# Altium PCB Sampler_DIOT.PCBDOC (part 1 of 11)
Units mm, origin at the board's own origin, x right, y up, seen from the top; angles counter-clockwise.
Board outline 222.9 x 100 mm, 4 copper layers (L1, P2, L3, L4), stack 1.6 mm thick; 754 components, 442 nets, 2347 pads, 1230 vias.
Unrouted connection lines stored in the file: 10.
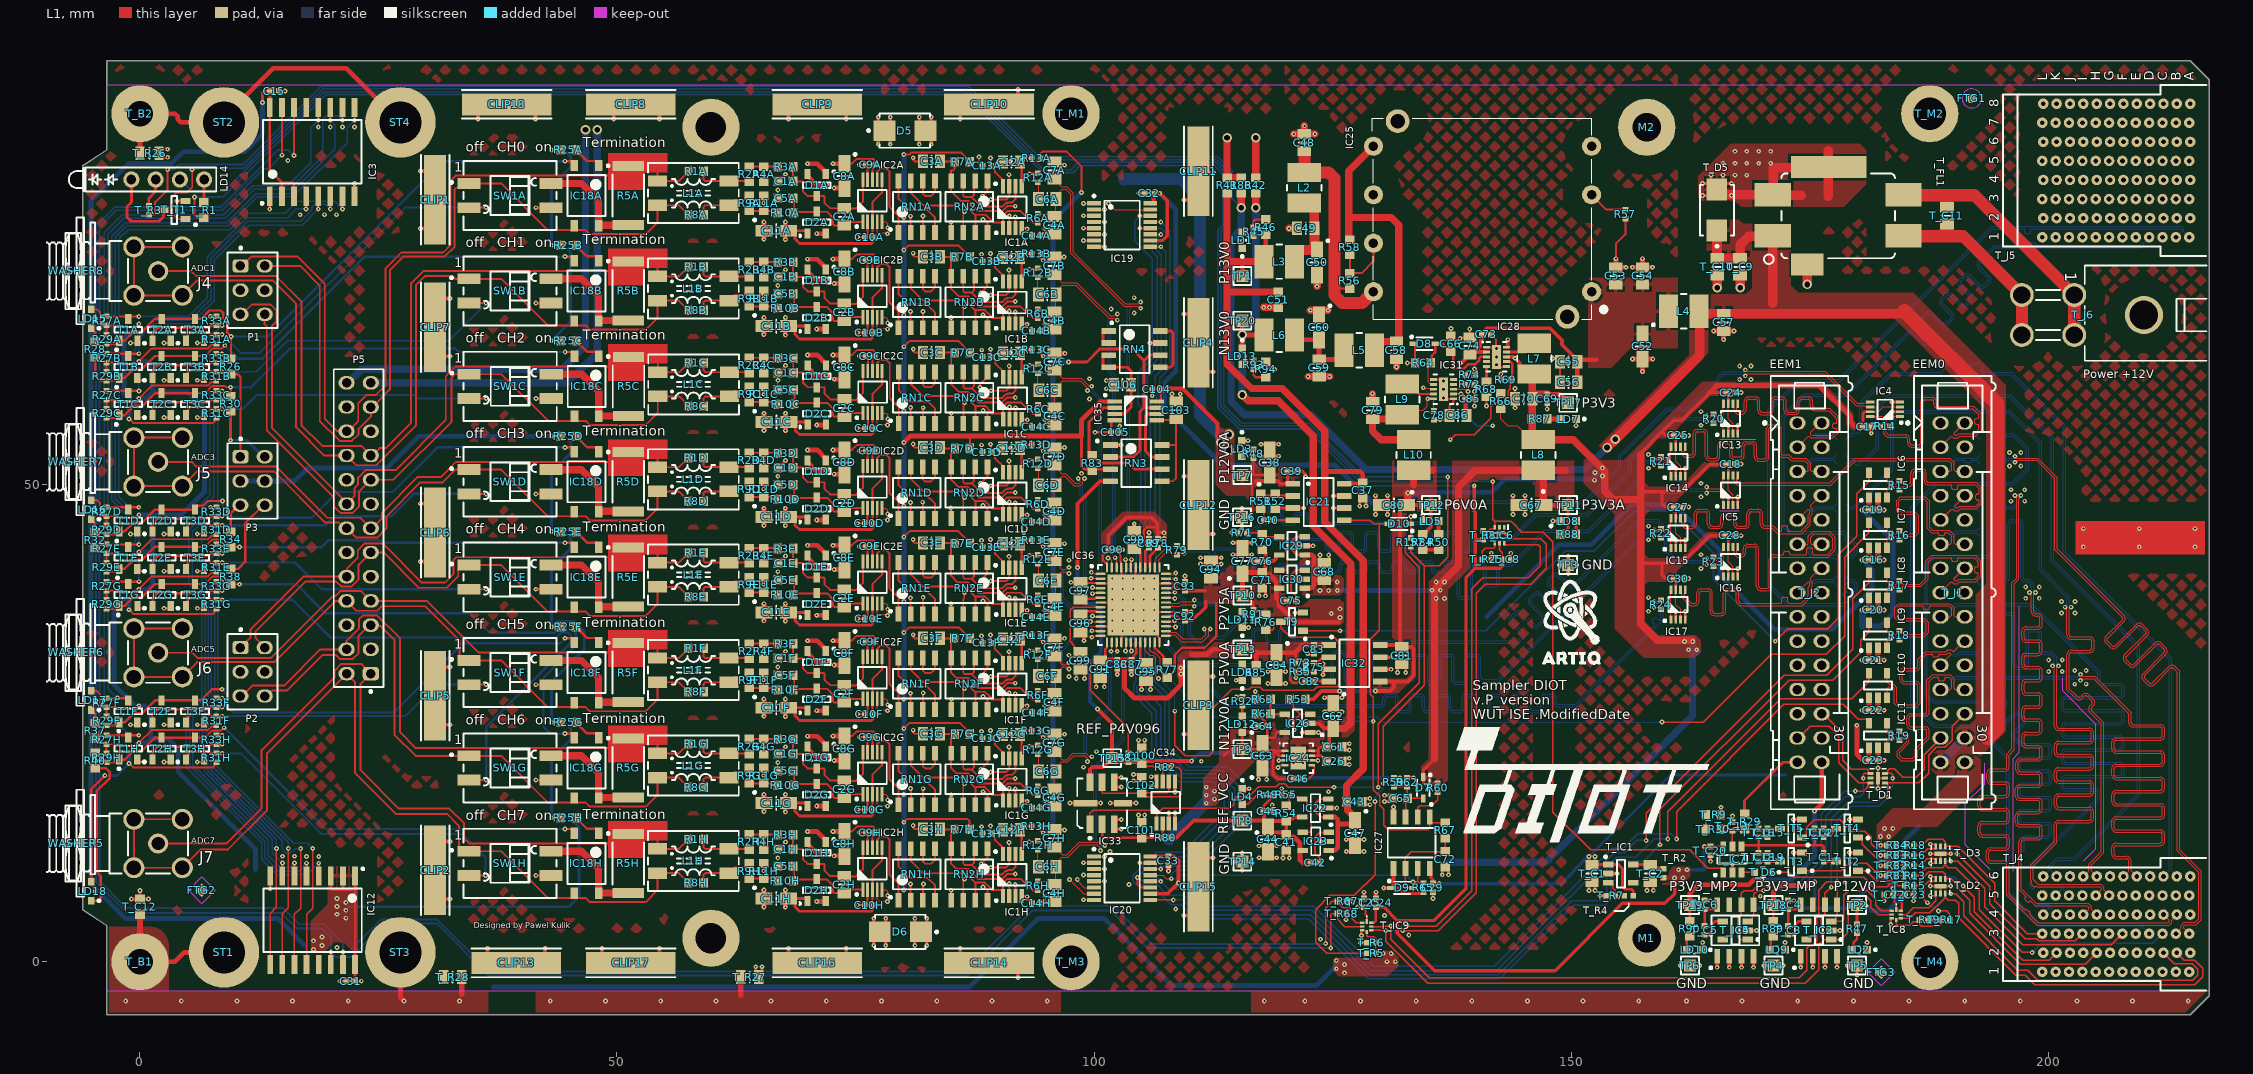
[diagram p0: L1 view]
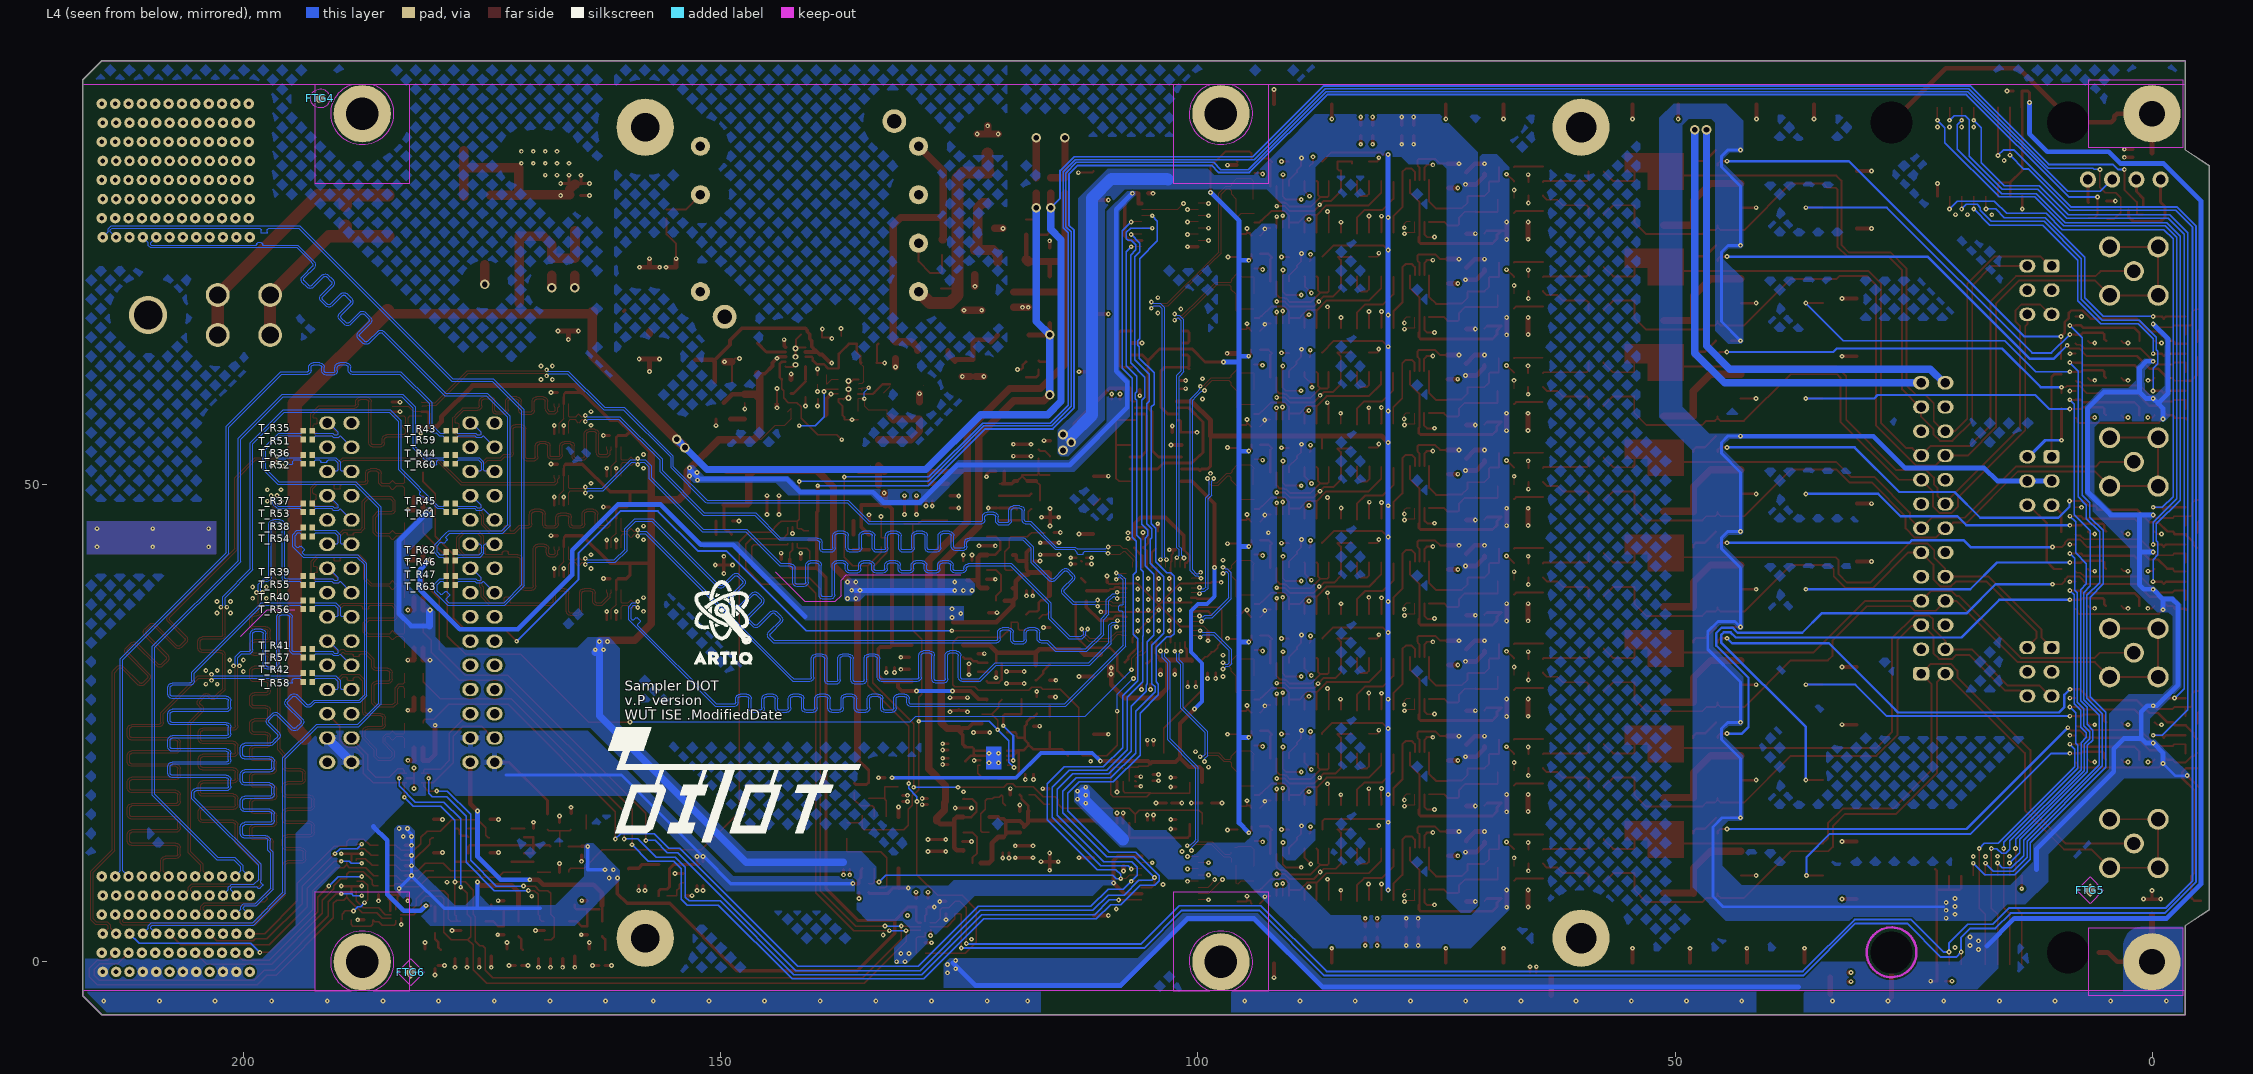
[diagram p1: L4 view, seen from below]
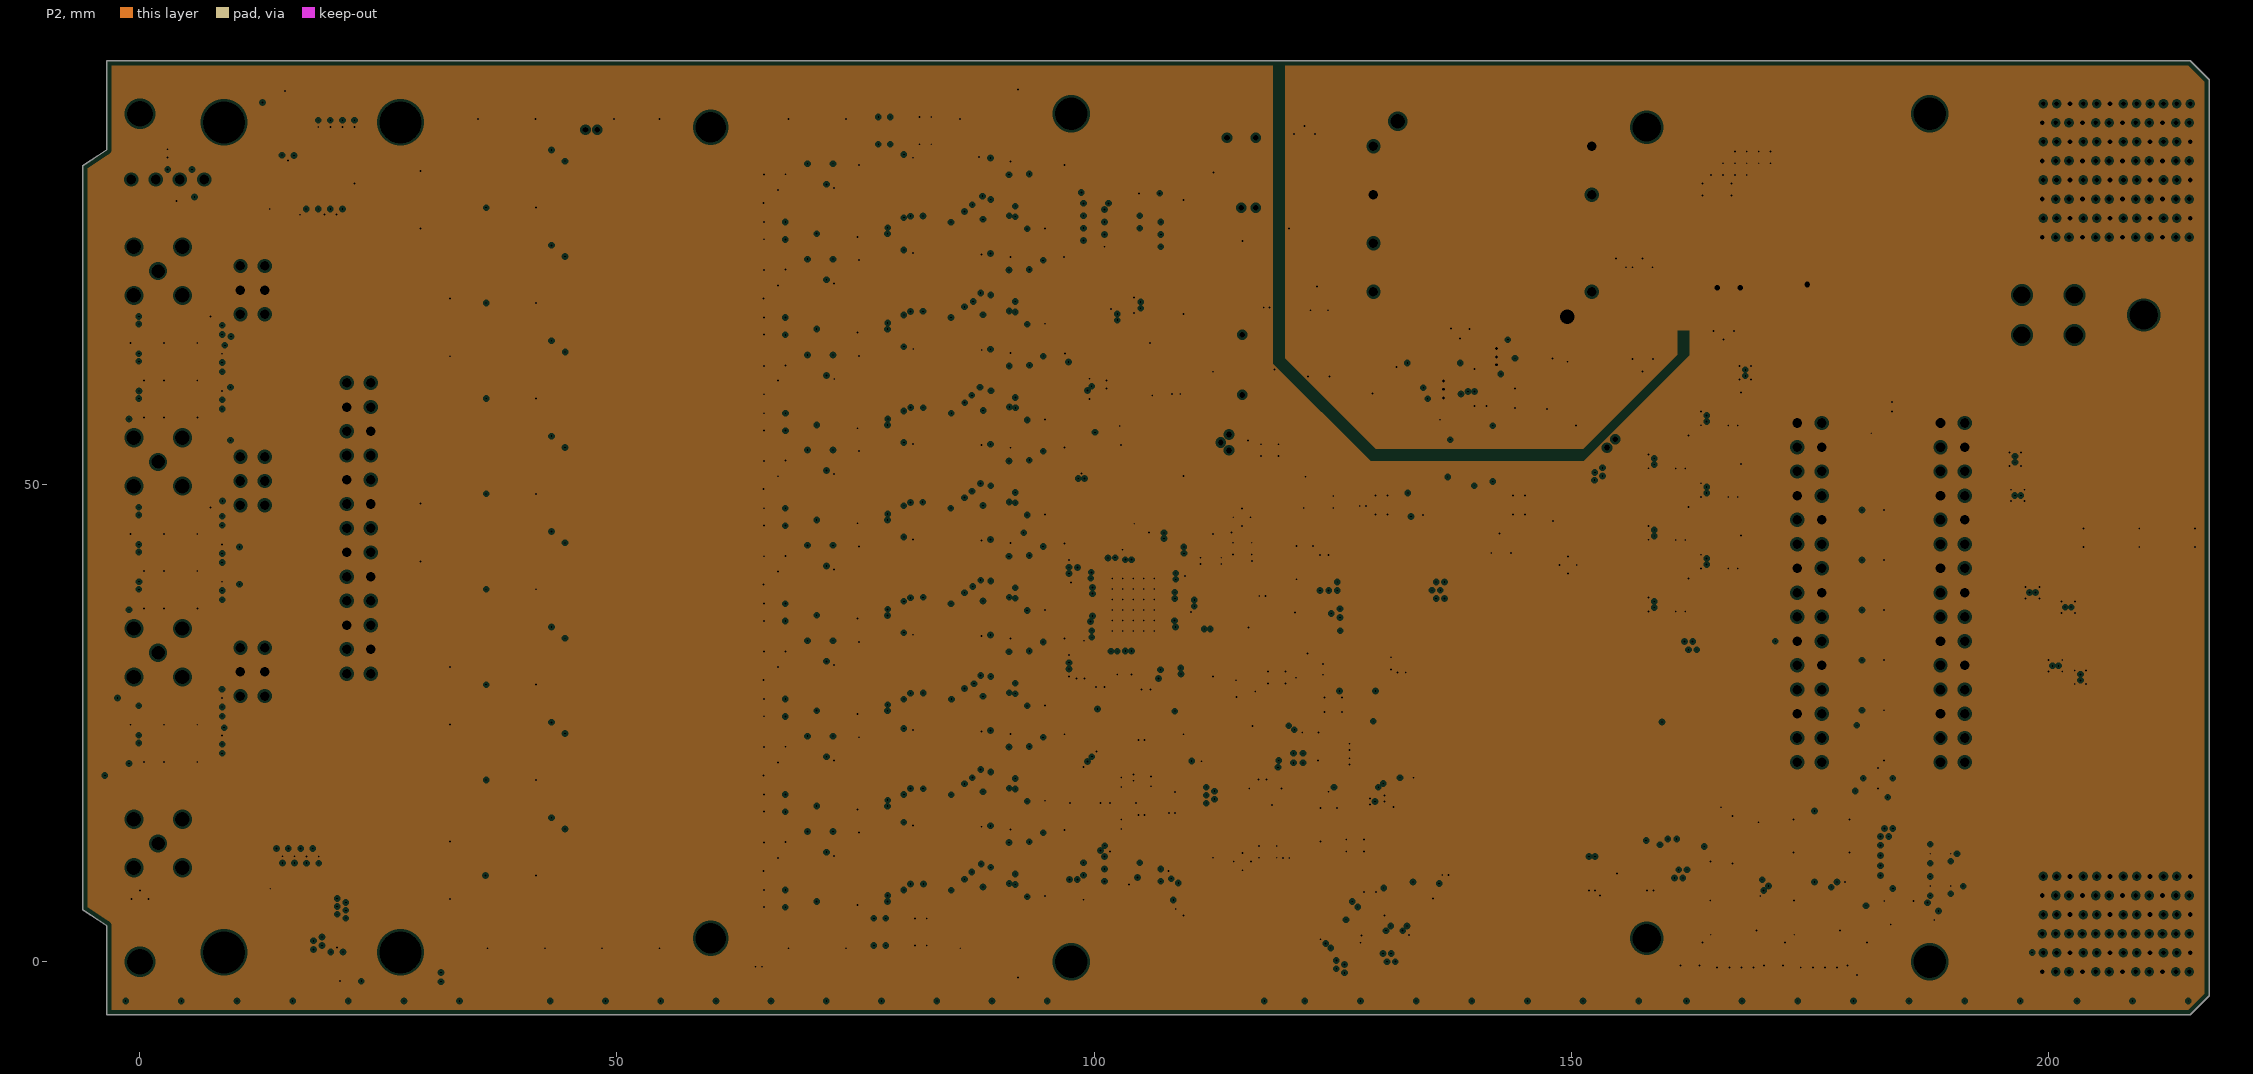
[diagram p2: P2, clearances drawn from the general rule]
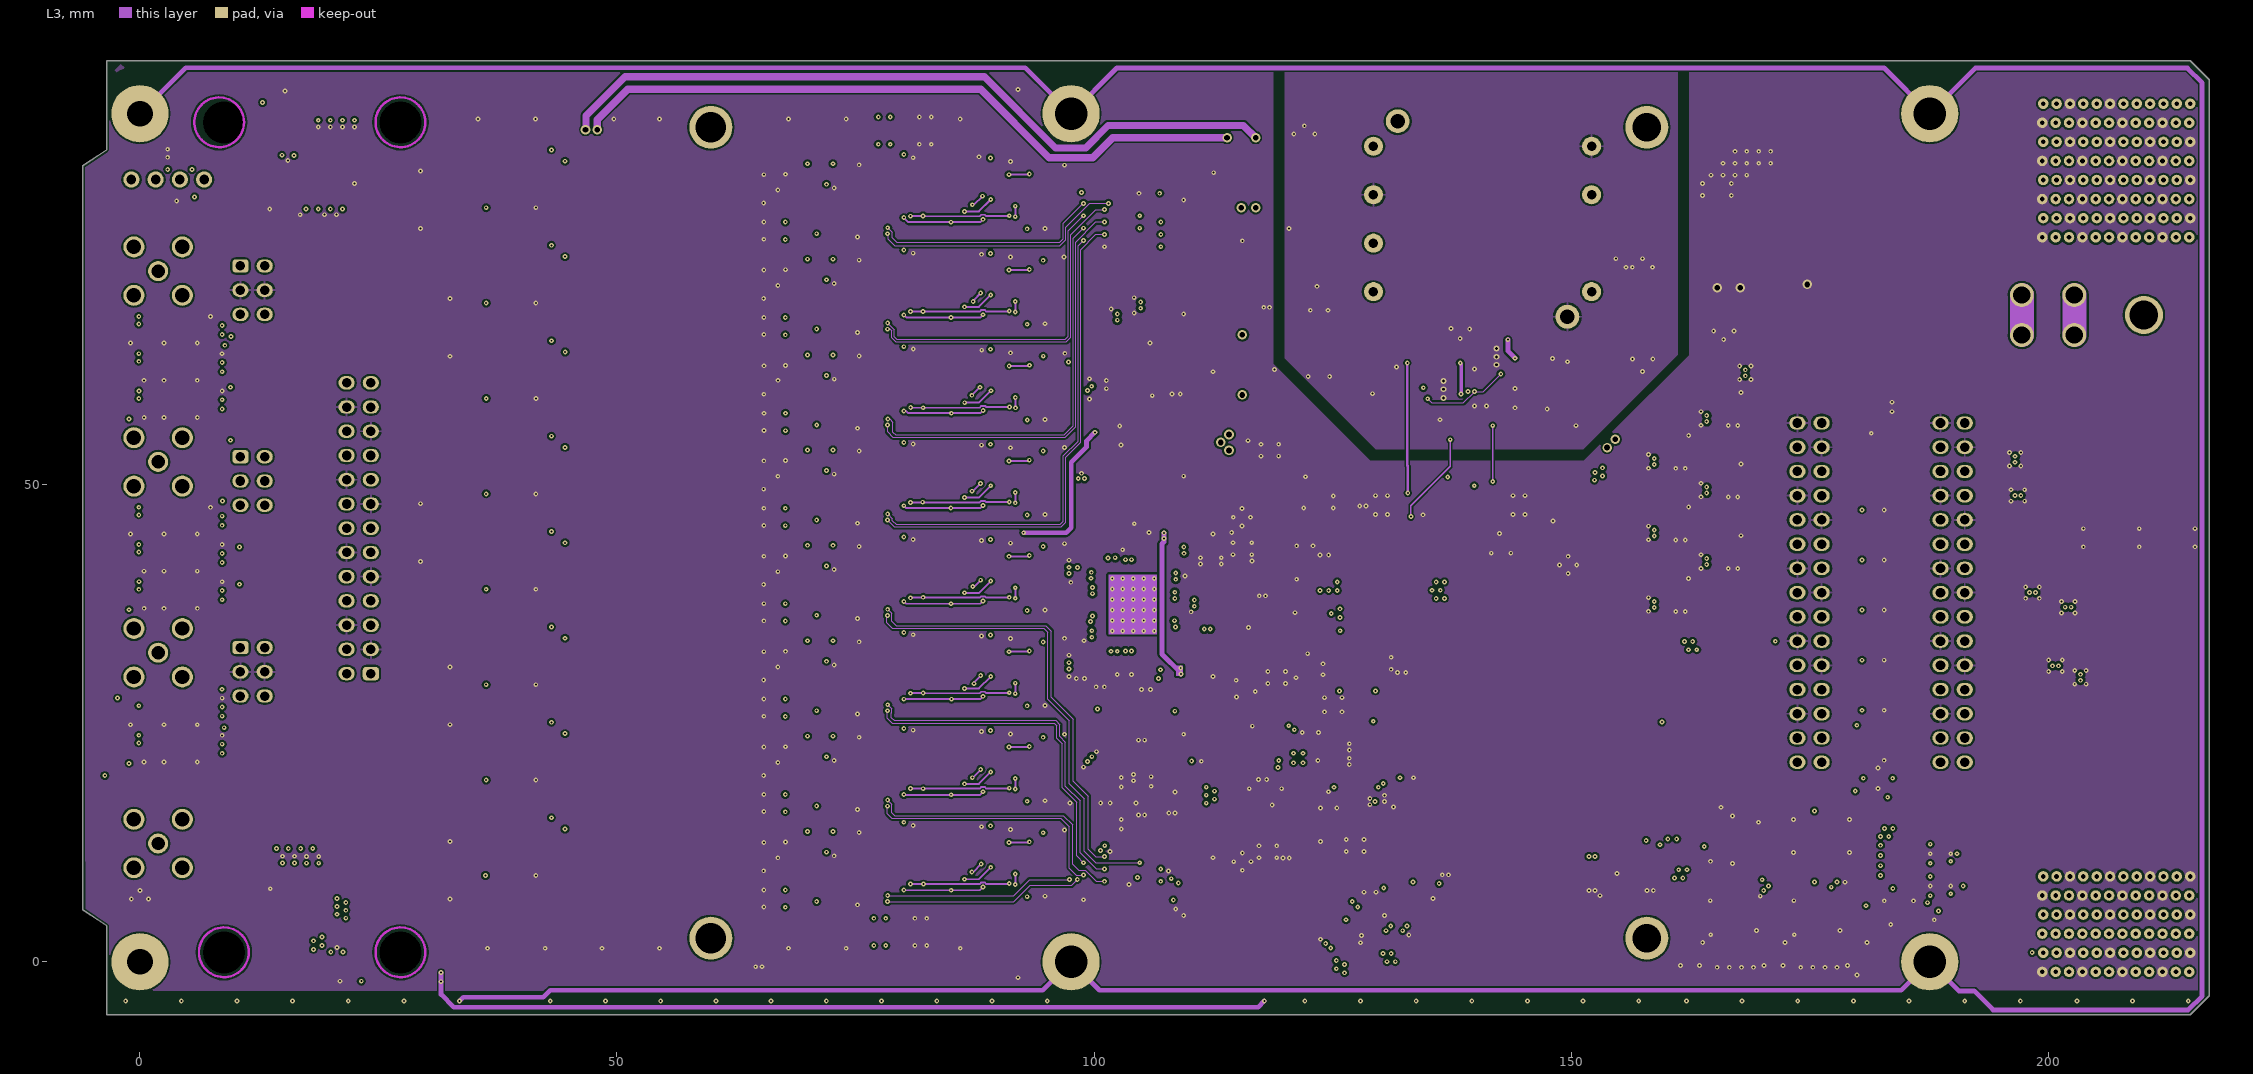
[diagram p3: L3]
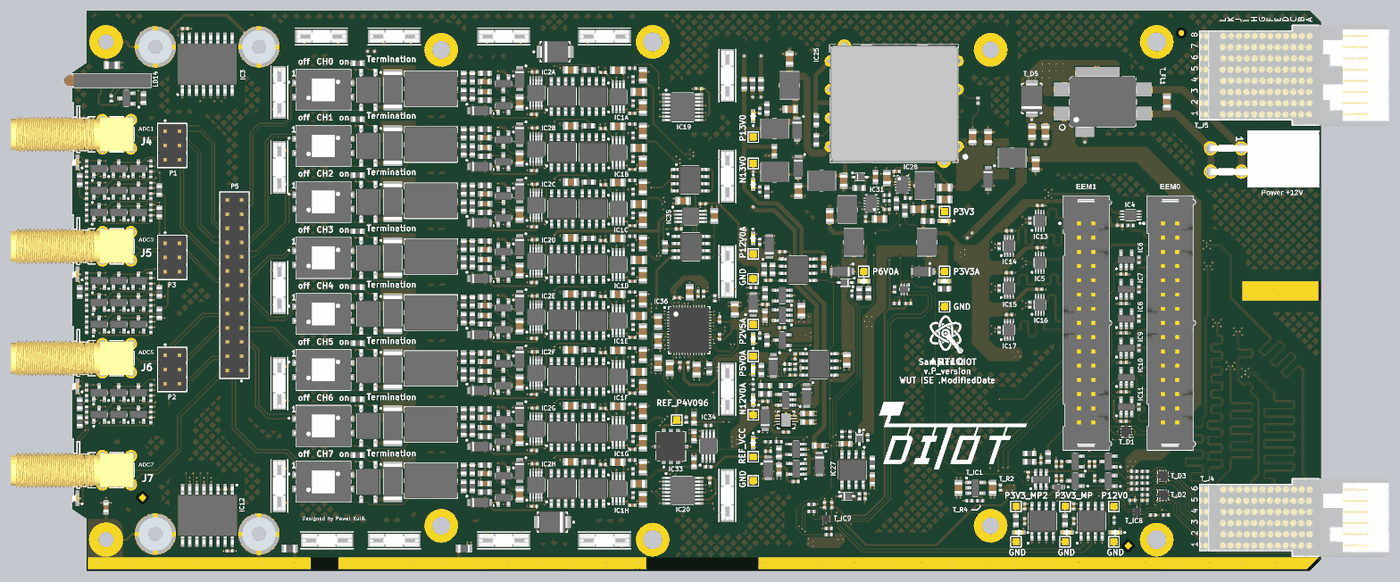
[diagram p13: 3D render of the assembled board from above, using the file's embedded part models]
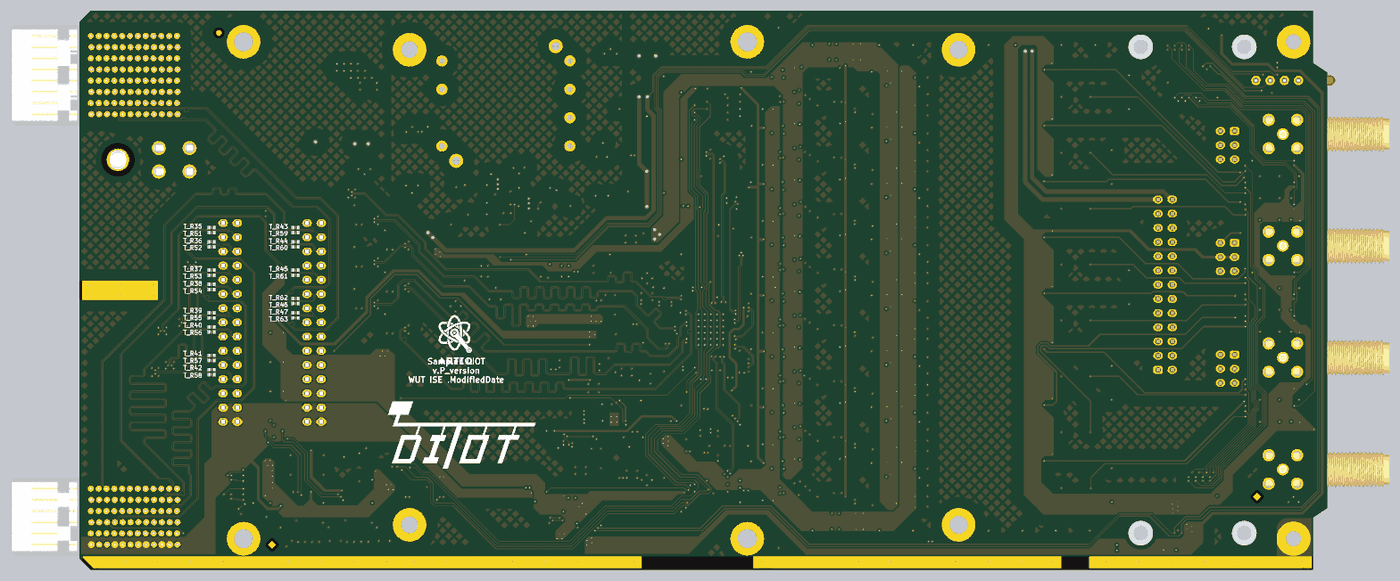
[diagram p14: 3D render of the assembled board from below, using the file's embedded part models]

## Layer stack, top to bottom
TopSolder: solder mask 0.0102, Solder Resist, Dk 3.5
L1: signal copper 0.045
Dielectric1: core 0.12, FR-4, Dk 4.2
P2: plane copper 0.035, net GND
Dielectric 3: prepreg 1.2, Dk 4.2
L3: signal copper 0.035
Dielectric2: core 0.12, FR-4, Dk 4.2
L4: signal copper 0.045
BottomSolder: solder mask 0.0102, Solder Resist, Dk 3.5

## Board outline
-3.5,3.8 -6,5.45 -6,83.45 -3.5,85.1 -3.5,94.45 214.9,94.45 216.9,92.45 216.9,-3.55 214.9,-5.55 -3.5,-5.55

## Design rules (kind name [scope] priority, off if disabled: settings)
AcuteAngle [All] p1: minimum=6.00000000000000E+0001 checktracksonly=FALSE
BoardOutlineClearance [not (OnSilkscreen and HasFootprint('LED_DIALIGHT_571-0122F')) and    not (OnSilkscreen and HasFootprint('LED_DIALIGHT_571-0112F')) and  not (OnSilkscreen and HasFootprint('DELOCK_65848')) and  not (OnSilkscreen and HasFootprint('Keystone_7687'))and  not (OnSilkscreen and HasFootprint('MOLEX_39-30-0040')) and   not (OnSilkscreen and HasFootprint('LED_AVAGO_HSME-C120'))] p1: gap=0.254 ignorepadtopadclearanceinfootprint=FALSE except(0: Arc-SplitContinuation Track-SplitContinuation SMDPad-SplitContinuation THPad-SplitContinuation Via-SplitContinuation Fill-SplitContinuation Poly-SplitContinuation Region-SplitContinuation Text-SplitContinuation)
Clearance Clearance_Balancing_To_Mechanicals [InPadClass('Mechanical') and (not PadIsPlated) vs InPolygonClass('PolyClass_Balancing')] p1: gap=0.7 ignorepadtopadclearanceinfootprint=FALSE // Clearance constraint used by the balancing polygon generator - between polygon and Mechanical pad class.
Clearance Clearance_Balancing_To_HV [InNetClass('HV') vs InPolygonClass('PolyClass_Balancing')] p2: gap=3 ignorepadtopadclearanceinfootprint=FALSE // Clearance constraint used by the balancing polygon generator - between polygon and HV Class.
Clearance Clearance_Balancing_To_DiffPair [InAnyDifferentialPair vs InPolygonClass('PolyClass_Balancing')] p3: gap=2.5 ignorepadtopadclearanceinfootprint=FALSE // Clearance constraint used by the balancing polygon generator - between polygon and Diff pairs.
Clearance Clearance_Balancing_To_Keepout [((not OnCopper) and isKeepout) vs InPolygonClass('PolyClass_Balancing')] p4: gap=0.127 ignorepadtopadclearanceinfootprint=FALSE // Clearance constraint used by the balancing polygon generator - between polygon and Keepout layer.
Clearance Clearance_Balancing_To_Poly [InPolygon vs InPolygonClass('PolyClass_Balancing')] p5: gap=2 ignorepadtopadclearanceinfootprint=FALSE // Clearance constraint used by the balancing polygon generator - between polygon and polygons.
Clearance Clearance_Balancing_To_Rest [not ((not OnCopper) and isKeepout) vs InPolygonClass('PolyClass_Balancing')] p6: gap=2 ignorepadtopadclearanceinfootprint=FALSE // Clearance constraint used by the balancing polygon generator - between polygon and everything else.
Clearance ESD_STRIP [All vs InNet('STRIP1') or InNet('STRIP2') or InNet('STRIP3')] p7 off: gap=0.127 ignorepadtopadclearanceinfootprint=FALSE except(0: Arc-Hole SMDPad-Hole THPad-Hole Via-Hole Fill-Hole Poly-Hole Region-Hole Text-Hole; 0.381: Arc-Poly SMDPad-Poly THPad-Poly Via-Poly Fill-Poly Poly-Poly; 1.5: Track-THPad Track-Via Track-Fill Track-Poly Track-Region Track-Text Track-Hole)
Clearance Clearance_Keepout_MH [IsKeepOut vs HasFootprint('c600h270')  or HasFootprint('PTH-M3.4X6.0_BTKO') or HasFootprint('FIDUCIAL_TOP_S100-200') or HasFootprint('FIDUCIAL_TOP_C100-200')] p8: gap=0 ignorepadtopadclearanceinfootprint=FALSE
Clearance Clearance_DIFF [(InDifferentialPairClass('All Differential Pairs'))] p9: gap=0.127 ignorepadtopadclearanceinfootprint=FALSE except(0: Arc-Hole Track-Hole SMDPad-Hole THPad-Hole Via-Hole Fill-Hole Poly-Hole Region-Hole Text-Hole; 0.254: Arc-Poly Track-Poly SMDPad-Poly THPad-Poly Via-Poly Fill-Poly Poly-Poly)
Clearance Clearance_Poly [InPoly] p10: gap=0.127 ignorepadtopadclearanceinfootprint=FALSE except(0: Arc-Hole Track-Hole SMDPad-Hole THPad-Hole Via-Hole Fill-Hole Poly-Hole Region-Hole Text-Hole; 0.2: Arc-Poly Track-Poly SMDPad-Poly THPad-Poly Via-Poly Fill-Poly Poly-Poly)
Clearance [All] p11: gap=0.127 ignorepadtopadclearanceinfootprint=TRUE except(0: Arc-Hole Track-Hole SMDPad-Hole THPad-Hole Via-Hole Fill-Hole Poly-Hole Region-Hole Text-Hole; 0.203: Track-Poly; 0.381: Arc-Poly SMDPad-Poly THPad-Poly Via-Poly Fill-Poly Poly-Poly)
ComponentClearance ComponentClearance_EEPROM_alternate [HasParameterValue('Manufacturer Part Number', '24AA025E48-I/SN') vs HasParameterValue('Manufacturer Part Number', '24AA02E48T-I/OT')] p1: gap=-1 collisioncheckmode=3 verticalgap=-1 showdistances=FALSE
ComponentClearance ComponentClearance_SMA_Washer [HasFootprint('DELOCK_65848')  or HasFootprint('AMPHENOL_132203-14') or HasFootprint('Keystone_7687') vs HasFootprint('Keystone_7687')] p2: gap=-1 collisioncheckmode=3 verticalgap=-1 showdistances=FALSE
ComponentClearance ComponentClearance_SMA_Connectors [HasFootprint('DELOCK_65848')  or HasFootprint('AMPHENOL_132203-14') or InNamedUnion('AdapterBoard') vs InNamedUnion('SMA_Connectors')] p3: gap=-1 collisioncheckmode=3 verticalgap=-1 showdistances=FALSE
ComponentClearance ComponentClearance_Case_to_ConnectorsLEDs [InNamedUnion('Case') vs HasFootprint('DELOCK_65848')  or HasFootprint('AMPHENOL_132203-14') or HasFootprint('LED_DIALIGHT_571-0112F')  or HasFootprint('LED_DIALIGHT_571-0122F')   or HasFootprint('LED_AVAGO_HSME-C120')] p4: gap=-1 collisioncheckmode=3 verticalgap=-1 showdistances=FALSE
ComponentClearance ComponentClearance_FP_to_ConnectorsLEDs [InNamedUnion('FrontPanel') vs HasFootprint('DELOCK_65848')  or HasFootprint('AMPHENOL_132203-14') or HasFootprint('LED_DIALIGHT_571-0112F') or HasFootprint('LED_DIALIGHT_571-0122F')  or HasFootprint('LED_AVAGO_HSME-C120')] p5: gap=-1 collisioncheckmode=3 verticalgap=-1 showdistances=FALSE
ComponentClearance ComponentClearance_Case_to_Fid [InNamedUnion('Case') vs HasFootprint('FIDUCIAL_TOP_C100-200')] p6: gap=-1 collisioncheckmode=3 verticalgap=-1 showdistances=FALSE
ComponentClearance ComponentClearance_Case_to_MH [InNamedUnion('Case') vs HasFootprint('PTH-M3.4X6.0_BTKO') or HasFootprint('c600h270')] p7: gap=-1 collisioncheckmode=3 verticalgap=-1 showdistances=FALSE
ComponentClearance ComponentClearance_FP_to_MH [InNamedUnion('FrontPanel') vs HasFootprint('PTH-M3.4X6.0_BTKO') or HasFootprint('c600h270')] p8: gap=-1 collisioncheckmode=3 verticalgap=-1 showdistances=FALSE
ComponentClearance ComponentClearance_Case_to_Washer [InNamedUnion('Case') vs HasFootprint('Keystone_7687')] p9: gap=-1 collisioncheckmode=3 verticalgap=-1 showdistances=FALSE
ComponentClearance ComponentClearance_FP_to_Washer [InNamedUnion('FrontPanel') vs HasFootprint('Keystone_7687')] p10: gap=-1 collisioncheckmode=3 verticalgap=-1 showdistances=FALSE
ComponentClearance ComponentClearance_FP_to_Case [InNamedUnion('FrontPanel') vs InNamedUnion('Case')] p11: gap=-1 collisioncheckmode=3 verticalgap=-1 showdistances=FALSE
ComponentClearance ComponentClearance_MH_to_fiducials [HasFootprint('FIDUCIAL_TOP_C100-200') vs HasFootprint('PTH-M3.4X6.0_BTKO')] p12: gap=-1 collisioncheckmode=3 verticalgap=-1 showdistances=FALSE
ComponentClearance ComponentClearance_Case_to_TH_pins [InNamedUnion('Case') vs InComponent('IC25')  or InComponent('P1') or InComponent('P2') or InComponent('P3') or InComponent('P5')    or InComponent('T_J6')] p13: gap=-1 collisioncheckmode=3 verticalgap=-1 showdistances=FALSE
ComponentClearance ComponentClearance_Shield_to_Clips [InNamedUnion('Shield') vs HasFootprint('CLIP_HOLLAND-SHIELDING_LC')] p14: gap=-1 collisioncheckmode=3 verticalgap=-1 showdistances=FALSE
ComponentClearance ComponentClearance_Shield_to_Case [InNamedUnion('Shield') vs InNamedUnion('Case')] p15: gap=-1 collisioncheckmode=3 verticalgap=-1 showdistances=FALSE
ComponentClearance ComponentClearance_Adapter_to_Connectors [InNamedUnion('AdapterBoard') vs InComponent('P1') or InComponent('P2') or InComponent('P3') or InComponent('P5')] p16: gap=-1 collisioncheckmode=3 verticalgap=-1 showdistances=FALSE
ComponentClearance ComponentClearance_Adapter_to_Standoffs [InNamedUnion('AdapterBoard') vs HasFootprint('9774120360')] p17: gap=-1 collisioncheckmode=3 verticalgap=-1 showdistances=FALSE
ComponentClearance ComponentClearance_Adapter_to_FP [InNamedUnion('AdapterBoard') vs InNamedUnion('FrontPanel')] p18: gap=-1 collisioncheckmode=3 verticalgap=-1 showdistances=FALSE
ComponentClearance ComponentClearance_InputFilters [InComponent('L1A') or  InComponent('L1B') or   InComponent('L1C') or   InComponent('L1D') or   InComponent('L1E') or   InComponent('L1F') or   InComponent('L1G') or   InComponent('L1H') vs InComponent('R1A') or InComponent('R8A')   or   InComponent('R1B') or InComponent('R8B')   or   InComponent('R1C') or InComponent('R8C')   or   InComponent('R1D') or InComponent('R8D')   or   InComponent('R1E') or InComponent('R8E')   or   InComponent('R1F') or InComponent('R8F')   or   InComponent('R1G') or InComponent('R8G')   or   InComponent('R1H') or InComponent('R8H')] p19: gap=-1 collisioncheckmode=3 verticalgap=-1 showdistances=FALSE
ComponentClearance [All] p20: gap=0.254 collisioncheckmode=3 verticalgap=0.254 showdistances=TRUE donotcheckwithout3dbody=TRUE
DiffPairsRouting [IsDifferentialPair] p1: maxlimit=0.127 minlimit=0.127 mostfreqgap=0.127 toplayer_minwidth=0.127 toplayer_maxwidth=0.127 toplayer_prefwidth=0.127 bottomlayer_minwidth=0.127 bottomlayer_maxwidth=0.127 bottomlayer_prefwidth=0.127 impedanceprofiledriven=TRUE impedanceprofileid={3B169204-1CC8-47AF-91E7-41E28CA6C3B4} impedanceprofilevalue=100.000000 maxuncoupledlength=21
FabricationTestPointUsage TestPointUsage [All] p1: valid=0 allowmultiple=FALSE
FabricationTestpoint Testpoint [All] p1: side=3 testpointundercomponent=TRUE minsize=1.016 maxsize=2.54 preferedsize=1.524 minholesize=0.508 maxholesize=1.016 preferedholesize=0.813 testpointgrid=0.025 allowsidetop=TRUE allowsidebottom=TRUE usegrid=TRUE gridtolerance=0
FanoutControl Fanout_Small [(CompPinCount < 5)] p1: bgadir=Out bgaviamode=Centered fanoutstyle=Auto fanoutdirection=OutThenIn viagrid=0.025 // Fanout_Small (Default Rule)
FanoutControl Fanout_Default [All] p2: bgadir=Out bgaviamode=Centered fanoutstyle=Auto fanoutdirection=Alternating viagrid=0.025 // Fanout_Default (Default Rule)
HoleSize [All] p1: absolutevalues=TRUE maxlimit=4.5 minlimit=0.025 maxpercent=80.000 minpercent=20.000
HoleToHoleClearance [All] p1: gap=0.025 allowstackedmicrovias=TRUE
MatchedLengths MatchedLengths_EEM_LVDS_Pair [InxSignalClass('xSignals_EEM')] p1: tolerance=10 checknetsindiffpair=TRUE checkdiffpairvsdiffpair=FALSE checkxsignals=FALSE checkothers=FALSE usedelayunits=TRUE delaytolerance=1.000000
MatchedLengths MatchedLengths_EEM_LVDS_Group [InxSignalClass('xSignals_EEM')] p2: tolerance=0 checknetsindiffpair=FALSE checkdiffpairvsdiffpair=TRUE checkxsignals=TRUE checkothers=TRUE usedelayunits=TRUE delaytolerance=80.000000
MatchedLengths MatchedLengths_BP_LVDS_Pair [InxSignalClass('xSignals_DIOT')] p3: tolerance=10 checknetsindiffpair=TRUE checkdiffpairvsdiffpair=FALSE checkxsignals=FALSE checkothers=FALSE usedelayunits=TRUE delaytolerance=1.000000
MatchedLengths MatchedLengths_BP_LVDS_Group [InxSignalClass('xSignals_DIOT')] p4: tolerance=15 checknetsindiffpair=FALSE checkdiffpairvsdiffpair=TRUE checkxsignals=TRUE checkothers=TRUE usedelayunits=TRUE delaytolerance=80.000000
MatchedLengths MatchedLengths_ADC_IN_Pair [InxSignalClass('xSignals_ADC_IN')] p5: tolerance=0 checknetsindiffpair=TRUE checkdiffpairvsdiffpair=FALSE checkxsignals=FALSE checkothers=FALSE usedelayunits=TRUE delaytolerance=25.000000
MatchedLengths MatchedLengths_ADC_IN_Group [InxSignalClass('xSignals_ADC_IN')] p6: tolerance=40 checknetsindiffpair=FALSE checkdiffpairvsdiffpair=TRUE checkxsignals=TRUE checkothers=TRUE usedelayunits=TRUE delaytolerance=230.000000
MatchedLengths MatchedLengths_ADC_Drv_Pair [InxSignalClass('xSignals_ADC_Drv')] p7: tolerance=10 checknetsindiffpair=TRUE checkdiffpairvsdiffpair=FALSE checkxsignals=FALSE checkothers=FALSE usedelayunits=TRUE delaytolerance=1.000000
MatchedLengths MatchedLengths_ADC_Drv_Group [InxSignalClass('xSignals_ADC_Drv')] p8: tolerance=10 checknetsindiffpair=FALSE checkdiffpairvsdiffpair=TRUE checkxsignals=TRUE checkothers=TRUE usedelayunits=TRUE delaytolerance=60.000000
MatchedLengths MatchedLengths_ADC_Drv_EEM_Pair [InxSignalClass('xSignals_ADC_Drv_EEM')] p9: tolerance=10 checknetsindiffpair=TRUE checkdiffpairvsdiffpair=FALSE checkxsignals=FALSE checkothers=FALSE usedelayunits=TRUE delaytolerance=1.000000
MatchedLengths MatchedLengths_ADC_Drv_EEM_Group [InxSignalClass('xSignals_ADC_Drv_EEM')] p10: tolerance=10 checknetsindiffpair=FALSE checkdiffpairvsdiffpair=TRUE checkxsignals=TRUE checkothers=TRUE usedelayunits=TRUE delaytolerance=60.000000
MatchedLengths MatchedLengths_ADC_Drv_DIOT_Pair [InxSignalClass('xSignals_ADC_Drv_DIOT')] p11: tolerance=10 checknetsindiffpair=TRUE checkdiffpairvsdiffpair=FALSE checkxsignals=FALSE checkothers=FALSE usedelayunits=TRUE delaytolerance=1.000000
MatchedLengths MatchedLengths_ADC_Drv_DIOT_Group [InxSignalClass('xSignals_ADC_Drv_DIOT')] p12: tolerance=10 checknetsindiffpair=FALSE checkdiffpairvsdiffpair=TRUE checkxsignals=TRUE checkothers=TRUE usedelayunits=TRUE delaytolerance=60.000000
MinimumSolderMaskSliver MinimumSolderMaskSliver_QFN_ADC [All vs HasFootprint('QFN50P700X800X80_HS-53M')] p1: minsoldermaskwidth=0.025
MinimumSolderMaskSliver MinimumSolderMaskSliver_FXMA2102UMX [All vs HasFootprint('FXMA2102UMX')] p2: minsoldermaskwidth=0.023
MinimumSolderMaskSliver [All] p3: minsoldermaskwidth=0.051
ParallelSegment [All vs InNetClass('ADC_IN')] p1: limit=10 gap=0.508
PlaneClearance [All] p1: clearance=0.254
PlaneConnect [All] p1: pad.planeconnectstyle=Relief pad.reliefexpansion=0.508 pad.reliefentries=4 pad.reliefconductorwidth=0.254 pad.reliefairgap=0.254 via.planeconnectstyle=Direct via.reliefexpansion=0.508 via.reliefentries=4 via.reliefconductorwidth=0.254 via.reliefairgap=0.254
PolygonConnect PolygonConnect_PressFit [All vs HasFootprint('AMPHENOL_10052825-101LF') or HasFootprint('AMPHENOL_10052838-101LF')] p1: connectstyle=Direct reliefconductorwidth=0.254 reliefentries=4 polygonreliefangle="90 Angle" airgapwidth=0.254
PolygonConnect PolygonConnect_PWR [All vs InNetClass('PWR')] p2: thpad.connectstyle=Relief thpad.reliefconductorwidth=0.6 thpad.reliefentries=4 thpad.polygonreliefangle="90 Angle" thpad.airgapwidth=0.254 smdpad.connectstyle=Relief smdpad.reliefconductorwidth=0.4 smdpad.reliefentries=4 smdpad.polygonreliefangle="90 Angle" smdpad.airgapwidth=0.254 via.connectstyle=Direct via.reliefconductorwidth=0.254 via.reliefentries=4 via.polygonreliefangle="90 Angle" via.airgapwidth=0.254
PolygonConnect [All] p3: thpad.connectstyle=Relief thpad.reliefconductorwidth=0.254 thpad.reliefentries=4 thpad.polygonreliefangle="90 Angle" thpad.airgapwidth=0.254 smdpad.connectstyle=Relief smdpad.reliefconductorwidth=0.254 smdpad.reliefentries=4 smdpad.polygonreliefangle="90 Angle" smdpad.airgapwidth=0.254 via.connectstyle=Direct via.reliefconductorwidth=0.254 via.reliefentries=4 via.polygonreliefangle="90 Angle" via.airgapwidth=0.254
ReturnPath ReturnPath_Diff [InNetClass('New Class')] p1: impedanceprofileid={3B169204-1CC8-47AF-91E7-41E28CA6C3B4} _gaplimit=0
ReturnPath ReturnPath_50Ohm [InNetClass('ADC_IN')] p2: impedanceprofileid={9E40DA6C-C392-4780-9BCD-F7AD7DFDD65E} _gaplimit=0 _useantipads=TRUE
RoomDefinition U_PWR_Supply [InComponentClass('U_PWR_Supply')] p1: confinementstyle=ConfineIn formatcopy=TRUE lockcomponents=FALSE outline -7.831,-1.695 182.419,-1.695 182.419,91.855 -7.831,91.855
RoomDefinition U_Power_main_DCDC [InComponentClass('U_Power_main_DCDC')] p2: confinementstyle=ConfineIn formatcopy=TRUE lockcomponents=FALSE outline 75.844,0.58 167.244,0.58 167.244,90.28 75.844,90.28
RoomDefinition U_Input_channel8 [InComponentClass('U_Input_channel8')] p3: confinementstyle=ConfineIn formatcopy=TRUE lockcomponents=FALSE outline -4.281,5.105 97.144,5.105 97.144,24.58 -4.281,24.58
RoomDefinition U_Input_channel7 [InComponentClass('U_Input_channel7')] p4: confinementstyle=ConfineIn formatcopy=TRUE lockcomponents=FALSE outline -4.281,15.105 97.144,15.105 97.144,40.68 -4.281,40.68
RoomDefinition U_Input_channel6 [InComponentClass('U_Input_channel6')] p5: confinementstyle=ConfineIn formatcopy=TRUE lockcomponents=FALSE outline -4.281,23.655 97.144,23.655 97.144,36.13 -4.281,36.13
RoomDefinition U_Input_channel5 [InComponentClass('U_Input_channel5')] p6: confinementstyle=ConfineIn formatcopy=TRUE lockcomponents=FALSE outline -4.281,35.105 97.144,35.105 97.144,46.13 -4.281,46.13
RoomDefinition U_Input_channel4 [InComponentClass('U_Input_channel4')] p7: confinementstyle=ConfineIn formatcopy=TRUE lockcomponents=FALSE outline -4.281,43.58 97.144,43.58 97.144,56.13 -4.281,56.13
RoomDefinition U_Input_channel3 [InComponentClass('U_Input_channel3')] p8: confinementstyle=ConfineIn formatcopy=TRUE lockcomponents=FALSE outline -4.281,55.08 97.169,55.08 97.169,66.13 -4.281,66.13
RoomDefinition U_Input_channel2 [InComponentClass('U_Input_channel2')] p9: confinementstyle=ConfineIn formatcopy=TRUE lockcomponents=FALSE outline -4.281,59.705 97.144,59.705 97.144,76.13 -4.281,76.13
RoomDefinition U_Input_channel1 [InComponentClass('U_Input_channel1')] p10: confinementstyle=ConfineIn formatcopy=TRUE lockcomponents=FALSE outline -4.281,63.63 97.144,63.63 97.144,86.13 -4.281,86.13
RoomDefinition U_Drivers [InComponentClass('U_Drivers')] p11: confinementstyle=ConfineIn formatcopy=TRUE lockcomponents=FALSE outline 12.119,-2.82 185.469,-2.82 185.469,92.055 12.119,92.055
RoomDefinition U_ADC_8CH [InComponentClass('U_ADC_8CH')] p12: confinementstyle=ConfineIn formatcopy=TRUE lockcomponents=FALSE outline 97.169,11.955 122.994,11.955 122.994,67.505 97.169,67.505
RoomDefinition "Power input connector" [InComponentClass('Power input connector')] p13: confinementstyle=ConfineIn formatcopy=TRUE lockcomponents=FALSE outline 162.769,62.63 216.994,62.63 216.994,84.93 162.769,84.93
RoomDefinition Overlapping [InComponentClass('Overlapping')] p14: confinementstyle=ConfineIn formatcopy=TRUE lockcomponents=FALSE outline 193.446,-4.654 193.446,13.547 229.679,13.547 229.679,-4.654
RoutingVias [All] p1: holewidth=0.2 width=0.5 viastyle="Through Hole" minholewidth=0.2 minwidth=0.5 maxholewidth=0.711 maxwidth=1.27
SilkToSilkClearance [All] p1: silktosilkclearance=0.203
SilkToSolderMaskClearance SilkscreenOverComponentPads [IsPad] p1: minsilkscreentomaskgap=0.127 clearancetoexposedcopper=TRUE
SolderMaskExpansion SolderMaskExpansion_Via [isVia] p1: expansion=0.102 istentingtop=TRUE
SolderMaskExpansion [All] p2: expansion=0.051 istentingtop=FALSE
SupplyNets "Schematic Supply Nets_20" [InNet('P2V5A')] p1: voltage=0.000
SupplyNets "Schematic Supply Nets_19" [InNet('N12V0A')] p2: voltage=0.000
SupplyNets "Schematic Supply Nets_18" [InNet('REF_VCC')] p3: voltage=0.000
SupplyNets "Schematic Supply Nets_17" [InNet('P3V3')] p4: voltage=0.000
SupplyNets "Schematic Supply Nets_16" [InNet('N13V0')] p5: voltage=0.000
SupplyNets "Schematic Supply Nets_15" [InNet('P12V0A')] p6: voltage=0.000
SupplyNets "Schematic Supply Nets_14" [InNet('P6V0A')] p7: voltage=0.000
SupplyNets "Schematic Supply Nets_13" [InNet('P5V0A')] p8: voltage=0.000
SupplyNets "Schematic Supply Nets_12" [InNet('P12V0')] p9: voltage=0.000
SupplyNets "Schematic Supply Nets_11" [InNet('REF_P4V096')] p10: voltage=0.000
SupplyNets "Schematic Supply Nets_10" [InNet('P6V0')] p11: voltage=0.000
SupplyNets "Schematic Supply Nets_9" [InNet('P3V3_MP')] p12: voltage=0.000
SupplyNets "Schematic Supply Nets_8" [InNet('REF_P2V048')] p13: voltage=0.000
SupplyNets "Schematic Supply Nets_7" [InNet('GND')] p14: voltage=0.000
SupplyNets "Schematic Supply Nets_6" [InNet('P13V0')] p15: voltage=0.000
SupplyNets "Schematic Supply Nets_5" [InNet('N13V0S')] p16: voltage=0.000
SupplyNets "Schematic Supply Nets_4" [InNet('CHASSIS')] p17: voltage=0.000
SupplyNets "Schematic Supply Nets_3" [InNet('REF_P1V7066')] p18: voltage=0.000
SupplyNets "Schematic Supply Nets_2" [InNet('P3V3A')] p19: voltage=0.000
SupplyNets "Schematic Supply Nets_1" [InNet('P13V0S')] p20: voltage=0.000
SupplyNets "Schematic Supply Nets" [InNet('P3V3_MP2')] p21: voltage=0.000
UnRoutedNet [not InPolygonClass('PolyClass_Balancing')] p1: checkbadconnections=TRUE
Width ADC_50Ohm [InNetClass('50_Ohms')] p1: maxlimit=0.199 minlimit=0.145 preferedwidth=0.199 toplayer_minwidth=0.199 midlayer1_maxwidth=0.145 midlayer1_prefwidth=0.145 bottomlayer_minwidth=0.199 impedanceprofiledriven=TRUE impedanceprofileid={9E40DA6C-C392-4780-9BCD-F7AD7DFDD65E} impedanceprofilevalue=50.000000 minimp=50.000000 maximp=50.000000 favimp=50.000000
Width [All] p2: maxlimit=2.5 minlimit=0.127 preferedwidth=0.254 minimp=50.000000 maximp=50.000000 favimp=50.000000
13 further rules are at their usual default settings.

## Classes and differential pairs
net class TERM_LEDn[7..0]: TERM_LEDn0 TERM_LEDn1 TERM_LEDn2 TERM_LEDn3 TERM_LEDn4 TERM_LEDn5 TERM_LEDn6 TERM_LEDn7
net class TERM_EN[7..0]: TERM_EN0 TERM_EN1 TERM_EN2 TERM_EN3 TERM_EN4 TERM_EN5 TERM_EN6 TERM_EN7
net class 50_Ohms: IN_N0 IN_N1 IN_N2 IN_N3 IN_N4 IN_N5 IN_N6 IN_N7 IN_P0 IN_P1 IN_P2 IN_P3 IN_P4 IN_P5 IN_P6 IN_P7
component class U_PWR_Supply: T_C1 T_C2 T_IC1 T_R2 T_R4 T_R7 T_R8
polygon class PolyClass_Balancing: Balancing_L1 Balancing_L3 Balancing_L4
differential pair class MGT: BP_MGT_Rx BP_MGT_Tx
differential pair class Diff_100Ohm: BP_CLK.CLK BP_IO.LVDS0 BP_IO.LVDS1 BP_IO.LVDS2 BP_IO.LVDS3 BP_IO.LVDS4 BP_IO.LVDS5 BP_IO.LVDS6 BP_IO.LVDS7 BP_IO.LVDS8 BP_IO.LVDS9 BP_IO.LVDS10 BP_IO.LVDS11 BP_IO.LVDS12 BP_IO.LVDS13 BP_IO.LVDS14 BP_IO.LVDS15 EEM_IO.LVDS0 EEM_IO.LVDS1 EEM_IO.LVDS2 EEM_IO.LVDS3 EEM_IO.LVDS4 EEM_IO.LVDS5 EEM_IO.LVDS6 EEM_IO.LVDS7 EEM_IO.LVDS8 EEM_IO.LVDS9 EEM_IO.LVDS10 EEM_IO.LVDS11 EEM_IO.LVDS12 EEM_IO.LVDS13 EEM_IO.LVDS14 EEM_IO.LVDS15
net class TERM_IND[7..0]: TERM_IND0 TERM_IND1 TERM_IND2 TERM_IND3 TERM_IND4 TERM_IND5 TERM_IND6 TERM_IND7
net class IN_P[7..0]: IN_P0 IN_P1 IN_P2 IN_P3 IN_P4 IN_P5 IN_P6 IN_P7
net class IN_N[7..0]: IN_N0 IN_N1 IN_N2 IN_N3 IN_N4 IN_N5 IN_N6 IN_N7
net class ESD_STRIP: CHASSIS STRIP2 STRIP3
net class A1[7..0]: A10 A11 A12 A13 A14 A15 A16 A17
net class A0[7..0]: A00 A01 A02 A03 A04 A05 A06 A07
component class U_Temp_monitoring: T_C8 T_IC6 T_R25
component class LEDs: LD1 LD2 LD3 LD4 LD5 LD6 LD7 LD8 LD9 LD10 LD11 LD12 LD13 LD14 R45 R46 R47 R48 R49 R50 R84 R85 R87 R88 R89 R90 R91 R92 R93 R94 T_R1 T_R3 T_T1 TP1 TP2 TP3 TP4 TP5 TP6 TP7 TP8 TP9 TP10 TP11 TP12 TP13 TP14 TP15 TP16 TP17 TP18 TP19 TP20
component class U_Power-up_delay: T_C13 T_C14 T_C15 T_C16 T_C17 T_C18 T_C19 T_C20 T_C21 T_D6 T_IC7 T_R9 T_R29 T_R30 T_R31 T_R32 T_R33 T_R34 T_T2 T_T3 T_T4 T_T5
component class U_Mechanical: CLIP1 CLIP2 CLIP3 CLIP4 CLIP5 CLIP6 CLIP7 CLIP8 CLIP9 CLIP10 CLIP11 CLIP12 CLIP13 CLIP14 CLIP15 CLIP16 CLIP17 CLIP18 FTG1 FTG2 FTG3 FTG4 FTG5 FTG6 M1 M2 S ST1 ST2 ST3 ST4 T_B1 T_B2 T_C12 T_M1 T_M2 T_M3 T_M4 T_R26 T_R27 T_R28 WASHER5 WASHER6 WASHER7 WASHER8
component class U_DIOT_signal_routing: T_C22 T_C23 T_IC8 T_R35 T_R36 T_R37 T_R38 T_R39 T_R40 T_R41 T_R42 T_R43 T_R44 T_R45 T_R46 T_R47 T_R51 T_R52 T_R53 T_R54 T_R55 T_R56 T_R57 T_R58 T_R59 T_R60 T_R61 T_R62 T_R63
component class Overlapping: T_J4
component class "I2C switch": T_C24 T_C25 T_IC9 T_R5 T_R6 T_R67 T_R68
component class EEM_Connectors: T_C3 T_C4 T_C5 T_C6 T_D1 T_IC2 T_IC3 T_IC4 T_IC5 T_J1 T_J2
net class ADC_IN_P[7..0]: ADC_IN_P0 ADC_IN_P1 ADC_IN_P2 ADC_IN_P3 ADC_IN_P4 ADC_IN_P5 ADC_IN_P6 ADC_IN_P7
net class ADC_IN_N[7..0]: ADC_IN_N0 ADC_IN_N1 ADC_IN_N2 ADC_IN_N3 ADC_IN_N4 ADC_IN_N5 ADC_IN_N6 ADC_IN_N7
net class PWR: N12V0A N13V0 N13V0S NetC49_2 NetC52_1 NetC59_2 NetT_C2_2 NetT_C11_2 P2V5A P3V3 P3V3_MP P3V3_MP2 P3V3A P5V0A P6V0 P6V0A P12V0 P12V0A P13V0 P13V0S REF_P4V096 REF_VCC
net class GA[0..3]: GA0 GA1 GA2 GA3
net class EEM_IO.LVDS_P[0..15]: EEM_IO.LVDS_P0 EEM_IO.LVDS_P1 EEM_IO.LVDS_P2 EEM_IO.LVDS_P3 EEM_IO.LVDS_P4 EEM_IO.LVDS_P5 EEM_IO.LVDS_P6 EEM_IO.LVDS_P7 EEM_IO.LVDS_P8 EEM_IO.LVDS_P9 EEM_IO.LVDS_P10 EEM_IO.LVDS_P11 EEM_IO.LVDS_P12 EEM_IO.LVDS_P13 EEM_IO.LVDS_P14 EEM_IO.LVDS_P15
net class EEM_IO.LVDS_N[0..15]: EEM_IO.LVDS_N0 EEM_IO.LVDS_N1 EEM_IO.LVDS_N2 EEM_IO.LVDS_N3 EEM_IO.LVDS_N4 EEM_IO.LVDS_N5 EEM_IO.LVDS_N6 EEM_IO.LVDS_N7 EEM_IO.LVDS_N8 EEM_IO.LVDS_N9 EEM_IO.LVDS_N10 EEM_IO.LVDS_N11 EEM_IO.LVDS_N12 EEM_IO.LVDS_N13 EEM_IO.LVDS_N14 EEM_IO.LVDS_N15
net class BP_IO.LVDS_P[0..15]: BP_IO.LVDS_P0 BP_IO.LVDS_P1 BP_IO.LVDS_P2 BP_IO.LVDS_P3 BP_IO.LVDS_P4 BP_IO.LVDS_P5 BP_IO.LVDS_P6 BP_IO.LVDS_P7 BP_IO.LVDS_P8 BP_IO.LVDS_P9 BP_IO.LVDS_P10 BP_IO.LVDS_P11 BP_IO.LVDS_P12 BP_IO.LVDS_P13 BP_IO.LVDS_P14 BP_IO.LVDS_P15
net class BP_IO.LVDS_N[0..15]: BP_IO.LVDS_N0 BP_IO.LVDS_N1 BP_IO.LVDS_N2 BP_IO.LVDS_N3 BP_IO.LVDS_N4 BP_IO.LVDS_N5 BP_IO.LVDS_N6 BP_IO.LVDS_N7 BP_IO.LVDS_N8 BP_IO.LVDS_N9 BP_IO.LVDS_N10 BP_IO.LVDS_N11 BP_IO.LVDS_N12 BP_IO.LVDS_N13 BP_IO.LVDS_N14 BP_IO.LVDS_N15
component class "Power input connector": T_C9 T_C10 T_C11 T_D5 T_FL1 T_J6
component class U_Drivers: C15 C16 C17 C18 C19 C20 C21 C22 C23 C24 C25 C27 C28 C30 C31 C32 C33 IC3 IC4 IC5 IC6 IC7 IC8 IC9 IC10 IC11 IC12 IC13 IC14 IC15 IC16 IC17 IC19 IC20 IC3000 IC3003 R14 R15 R16 R17 R18 R19 R20 R21 R22 R23 R24
component class CPCIS_Connectors_P1_P6: T_D2 T_D3 T_J4 T_J5 T_R13 T_R14 T_R15 T_R16 T_R17 T_R18 T_R19
channel class Input_channel: U_Input_channel1 U_Input_channel2 U_Input_channel3 U_Input_channel4 U_Input_channel5 U_Input_channel6 U_Input_channel7 U_Input_channel8
component class U_Power_main_DCDC: C26 C29 C37 C38 C39 C40 C41 C42 C43 C44 C45 C46 C47 C48 C49 C50 C51 C52 C53 C54 C55 C56 C57 C58 C59 C60 C61 C62 C63 C64 C65 C66 C67 C68 C69 C70 C71 C72 C73 C74 C75 C76 C77 C78 C79 C80 C81 C82 C83 C84 C85 C86 D5 D6 D7 D8 D9 D10 IC21 IC22 IC23 IC24 IC25 IC26 IC27 IC28 IC29 IC30 IC31 IC32 L2 L3 L4 L5 L6 L7 L8 L9 L10 R35 R51 R52 R53 R54 R55 R56 R57 R58 R59 R60 R61 R62 R63 R64 R65 R66 R67 R68 R69 R70 R71 R72 R73 R74 R75 R157
component class U_Input_channel8: C1H C2H C3H C4H C5H C6H C7H C8H C9H C10H C11H C12H C13H C14H D1H D2H IC1H IC2H IC18H L1H R1H R2H R3H R4H R5H R6H R7H R8H R9H R10H R11H R12H R13H R25H R27H R29H R31H R33H RN1H RN2H SW1H T1H T2H T3H
component class U_Input_channel7: C1G C2G C3G C4G C5G C6G C7G C8G C9G C10G C11G C12G C13G C14G D1G D2G IC1G IC2G IC18G L1G R1G R2G R3G R4G R5G R6G R7G R8G R9G R10G R11G R12G R13G R25G R27G R29G R31G R33G RN1G RN2G SW1G T1G T2G T3G
component class U_Input_channel6: C1F C2F C3F C4F C5F C6F C7F C8F C9F C10F C11F C12F C13F C14F D1F D2F IC1F IC2F IC18F L1F R1F R2F R3F R4F R5F R6F R7F R8F R9F R10F R11F R12F R13F R25F R27F R29F R31F R33F RN1F RN2F SW1F T1F T2F T3F
component class U_Input_channel5: C1E C2E C3E C4E C5E C6E C7E C8E C9E C10E C11E C12E C13E C14E D1E D2E IC1E IC2E IC18E L1E R1E R2E R3E R4E R5E R6E R7E R8E R9E R10E R11E R12E R13E R25E R27E R29E R31E R33E RN1E RN2E SW1E T1E T2E T3E
component class U_Input_channel4: C1D C2D C3D C4D C5D C6D C7D C8D C9D C10D C11D C12D C13D C14D D1D D2D IC1D IC2D IC18D L1D R1D R2D R3D R4D R5D R6D R7D R8D R9D R10D R11D R12D R13D R25D R27D R29D R31D R33D RN1D RN2D SW1D T1D T2D T3D
component class U_Input_channel3: C1C C2C C3C C4C C5C C6C C7C C8C C9C C10C C11C C12C C13C C14C D1C D2C IC1C IC2C IC18C L1C R1C R2C R3C R4C R5C R6C R7C R8C R9C R10C R11C R12C R13C R25C R27C R29C R31C R33C RN1C RN2C SW1C T1C T2C T3C
component class U_Input_channel2: C1B C2B C3B C4B C5B C6B C7B C8B C9B C10B C11B C12B C13B C14B D1B D2B IC1B IC2B IC18B L1B R1B R2B R3B R4B R5B R6B R7B R8B R9B R10B R11B R12B R13B R25B R27B R29B R31B R33B RN1B RN2B SW1B T1B T2B T3B
component class U_Input_channel1: C1A C2A C3A C4A C5A C6A C7A C8A C9A C10A C11A C12A C13A C14A D1A D2A IC1A IC2A IC18A L1A R1A R2A R3A R4A R5A R6A R7A R8A R9A R10A R11A R12A R13A R25A R27A R29A R31A R33A RN1A RN2A SW1A T1A T2A T3A
component class U_ADC_8CH: C87 C88 C89 C90 C91 C92 C93 C94 C95 C96 C97 C98 C99 C100 C101 C102 C103 C104 C105 C106 IC33 IC34 IC35 IC36 R76 R77 R78 R79 R80 R81 R82 R83 RN3 RN4 T9
component class U_FP_Connectors: eg J4 J5 J6 J7 LD15 LD16 LD17 LD18 P1 P2 P3 P5 R26 R28 R30 R32 R34 R37 R38 R40 R41 R42 R86
differential pair EEM_IO.LVDS15: +EEM_IO.LVDS_P15 -EEM_IO.LVDS_N15
differential pair EEM_IO.LVDS14: +EEM_IO.LVDS_P14 -EEM_IO.LVDS_N14
differential pair EEM_IO.LVDS13: +EEM_IO.LVDS_P13 -EEM_IO.LVDS_N13
differential pair EEM_IO.LVDS12: +EEM_IO.LVDS_P12 -EEM_IO.LVDS_N12
differential pair EEM_IO.LVDS11: +EEM_IO.LVDS_P11 -EEM_IO.LVDS_N11
differential pair EEM_IO.LVDS10: +EEM_IO.LVDS_P10 -EEM_IO.LVDS_N10
differential pair EEM_IO.LVDS9: +EEM_IO.LVDS_P9 -EEM_IO.LVDS_N9
differential pair EEM_IO.LVDS8: +EEM_IO.LVDS_P8 -EEM_IO.LVDS_N8
differential pair EEM_IO.LVDS7: +EEM_IO.LVDS_P7 -EEM_IO.LVDS_N7
differential pair EEM_IO.LVDS6: +EEM_IO.LVDS_P6 -EEM_IO.LVDS_N6
differential pair EEM_IO.LVDS5: +EEM_IO.LVDS_P5 -EEM_IO.LVDS_N5
differential pair EEM_IO.LVDS4: +EEM_IO.LVDS_P4 -EEM_IO.LVDS_N4
differential pair EEM_IO.LVDS3: +EEM_IO.LVDS_P3 -EEM_IO.LVDS_N3
differential pair EEM_IO.LVDS2: +EEM_IO.LVDS_P2 -EEM_IO.LVDS_N2
differential pair EEM_IO.LVDS1: +EEM_IO.LVDS_P1 -EEM_IO.LVDS_N1
differential pair EEM_IO.LVDS0: +EEM_IO.LVDS_P0 -EEM_IO.LVDS_N0
differential pair BP_CLK.CLK: +BP_CLK.CLK_P -BP_CLK.CLK_N
differential pair ADC_IN7: +ADC_IN_P7 -ADC_IN_N7
differential pair ADC_IN6: +ADC_IN_P6 -ADC_IN_N6
differential pair ADC_IN5: +ADC_IN_P5 -ADC_IN_N5
differential pair ADC_IN4: +ADC_IN_P4 -ADC_IN_N4
differential pair ADC_IN3: +ADC_IN_P3 -ADC_IN_N3
differential pair ADC_IN2: +ADC_IN_P2 -ADC_IN_N2
differential pair ADC_IN1: +ADC_IN_P1 -ADC_IN_N1
differential pair ADC_IN0: +ADC_IN_P0 -ADC_IN_N0
differential pair BP_MGT_Tx: +BP_MGT_Tx_P -BP_MGT_Tx_N
differential pair BP_MGT_Rx: +BP_MGT_Rx_P -BP_MGT_Rx_N
differential pair BP_IO.LVDS15: +BP_IO.LVDS_P15 -BP_IO.LVDS_N15
differential pair BP_IO.LVDS14: +BP_IO.LVDS_P14 -BP_IO.LVDS_N14
differential pair BP_IO.LVDS13: +BP_IO.LVDS_P13 -BP_IO.LVDS_N13
differential pair BP_IO.LVDS12: +BP_IO.LVDS_P12 -BP_IO.LVDS_N12
differential pair BP_IO.LVDS11: +BP_IO.LVDS_P11 -BP_IO.LVDS_N11
differential pair BP_IO.LVDS10: +BP_IO.LVDS_P10 -BP_IO.LVDS_N10
differential pair BP_IO.LVDS9: +BP_IO.LVDS_P9 -BP_IO.LVDS_N9
differential pair BP_IO.LVDS8: +BP_IO.LVDS_P8 -BP_IO.LVDS_N8
differential pair BP_IO.LVDS7: +BP_IO.LVDS_P7 -BP_IO.LVDS_N7
differential pair BP_IO.LVDS6: +BP_IO.LVDS_P6 -BP_IO.LVDS_N6
differential pair BP_IO.LVDS5: +BP_IO.LVDS_P5 -BP_IO.LVDS_N5
differential pair BP_IO.LVDS4: +BP_IO.LVDS_P4 -BP_IO.LVDS_N4
differential pair BP_IO.LVDS3: +BP_IO.LVDS_P3 -BP_IO.LVDS_N3
differential pair BP_IO.LVDS2: +BP_IO.LVDS_P2 -BP_IO.LVDS_N2
differential pair BP_IO.LVDS1: +BP_IO.LVDS_P1 -BP_IO.LVDS_N1
differential pair BP_IO.LVDS0: +BP_IO.LVDS_P0 -BP_IO.LVDS_N0
differential pair ADC_CLKOUT: +ADC_CLKOUT_P -ADC_CLKOUT_N
differential pair ADC_SCK: +ADC_SCK_P -ADC_SCK_N
differential pair ADC_SDOA: +ADC_SDOA_P -ADC_SDOA_N
differential pair ADC_SDOB: +ADC_SDOB_P -ADC_SDOB_N
differential pair ADC_SDOC: +ADC_SDOC_P -ADC_SDOC_N
differential pair ADC_SDOD: +ADC_SDOD_P -ADC_SDOD_N

## Components (designator, comment, footprint, x,y, rotation, side; value= is the part's Value field where it differs from the comment)
C1A "18pF" CAPC1608X87N 67.662,81.798 r0 top (schematic designator C1)
C1B "18pF" CAPC1608X87N 67.662,71.798 r0 top (schematic designator C1)
C1C "18pF" CAPC1608X87N 67.675,61.754 r0 top (schematic designator C1)
C1D "18pF" CAPC1608X87N 67.662,51.798 r0 top (schematic designator C1)
C1E "18pF" CAPC1608X87N 67.662,41.798 r0 top (schematic designator C1)
C1F "18pF" CAPC1608X87N 67.662,31.798 r0 top (schematic designator C1)
C1G "18pF" CAPC1608X87N 67.662,21.798 r0 top (schematic designator C1)
C1H "18pF" CAPC1608X87N 67.662,11.798 r0 top (schematic designator C1)
C2A "82pF" CAPC2012X90N 73.829,78.09 r90 top (schematic designator C2)
C2B "82pF" CAPC2012X90N 73.829,68.09 r90 top (schematic designator C2)
C2C "82pF" CAPC2012X90N 73.841,58.047 r90 top (schematic designator C2)
C2D "82pF" CAPC2012X90N 73.829,48.09 r90 top (schematic designator C2)
C2E "82pF" CAPC2012X90N 73.829,38.09 r90 top (schematic designator C2)
C2F "82pF" CAPC2012X90N 73.829,28.09 r90 top (schematic designator C2)
C2G "82pF" CAPC2012X90N 73.829,18.09 r90 top (schematic designator C2)
C2H "82pF" CAPC2012X90N 73.829,8.09 r90 top (schematic designator C2)
C3A "47nF" CAPC2012X135N 82.969,83.905 r0 top (schematic designator C3)
C3B "47nF" CAPC2012X135N 82.969,73.905 r0 top (schematic designator C3)
C3C "47nF" CAPC2012X135N 82.982,63.861 r0 top (schematic designator C3)
C3D "47nF" CAPC2012X135N 82.969,53.905 r0 top (schematic designator C3)
C3E "47nF" CAPC2012X135N 82.969,43.905 r0 top (schematic designator C3)
C3F "47nF" CAPC2012X135N 82.969,33.905 r0 top (schematic designator C3)
C3G "47nF" CAPC2012X135N 82.969,23.905 r0 top (schematic designator C3)
C3H "47nF" CAPC2012X135N 82.969,13.905 r0 top (schematic designator C3)
C4A "2.2nF" CAPC2013X100N 95.853,77.206 r90 top (schematic designator C4)
C4B "2.2nF" CAPC2013X100N 95.853,67.206 r90 top (schematic designator C4)
C4C "2.2nF" CAPC2013X100N 95.866,57.162 r90 top (schematic designator C4)
C4D "2.2nF" CAPC2013X100N 95.853,47.206 r90 top (schematic designator C4)
C4E "2.2nF" CAPC2013X100N 95.853,37.206 r90 top (schematic designator C4)
C4F "2.2nF" CAPC2013X100N 95.853,27.206 r90 top (schematic designator C4)
C4G "2.2nF" CAPC2013X100N 95.853,17.206 r90 top (schematic designator C4)
C4H "2.2nF" CAPC2013X100N 95.853,7.206 r90 top (schematic designator C4)
C5A "18pF" CAPC1608X87N 67.662,80.02 r0 top (schematic designator C5)
C5B "18pF" CAPC1608X87N 67.662,70.02 r0 top (schematic designator C5)
C5C "18pF" CAPC1608X87N 67.675,59.976 r0 top (schematic designator C5)
C5D "18pF" CAPC1608X87N 67.662,50.02 r0 top (schematic designator C5)
C5E "18pF" CAPC1608X87N 67.662,40.02 r0 top (schematic designator C5)
C5F "18pF" CAPC1608X87N 67.662,30.02 r0 top (schematic designator C5)
C5G "18pF" CAPC1608X87N 67.662,20.02 r0 top (schematic designator C5)
C5H "18pF" CAPC1608X87N 67.662,10.02 r0 top (schematic designator C5)
C6A "2.2nF" CAPC2013X100N 95.103,79.956 r0 top (schematic designator C6)
C6B "2.2nF" CAPC2013X100N 95.103,69.956 r0 top (schematic designator C6)
C6C "2.2nF" CAPC2013X100N 95.116,59.912 r0 top (schematic designator C6)
C6D "2.2nF" CAPC2013X100N 95.103,49.956 r0 top (schematic designator C6)
C6E "2.2nF" CAPC2013X100N 95.103,39.956 r0 top (schematic designator C6)
C6F "2.2nF" CAPC2013X100N 95.103,29.956 r0 top (schematic designator C6)
C6G "2.2nF" CAPC2013X100N 95.103,19.956 r0 top (schematic designator C6)
C6H "2.2nF" CAPC2013X100N 95.103,9.956 r0 top (schematic designator C6)
C7A "2.2nF" CAPC2013X100N 95.853,82.956 r90 top (schematic designator C7)
C7B "2.2nF" CAPC2013X100N 95.853,72.956 r90 top (schematic designator C7)
C7C "2.2nF" CAPC2013X100N 95.866,62.912 r90 top (schematic designator C7)
C7D "2.2nF" CAPC2013X100N 95.853,52.956 r90 top (schematic designator C7)
C7E "2.2nF" CAPC2013X100N 95.853,42.956 r90 top (schematic designator C7)
C7F "2.2nF" CAPC2013X100N 95.853,32.956 r90 top (schematic designator C7)
C7G "2.2nF" CAPC2013X100N 95.853,22.956 r90 top (schematic designator C7)
C7H "2.2nF" CAPC2013X100N 95.853,12.956 r90 top (schematic designator C7)
C8A "10uF" CAPMP3216X180N 73.829,82.358 r270 top (schematic designator C8)
C8B "10uF" CAPMP3216X180N 73.829,72.358 r270 top (schematic designator C8)
C8C "10uF" CAPMP3216X180N 73.841,62.314 r270 top (schematic designator C8)
C8D "10uF" CAPMP3216X180N 73.829,52.358 r270 top (schematic designator C8)
C8E "10uF" CAPMP3216X180N 73.829,42.358 r270 top (schematic designator C8)
C8F "10uF" CAPMP3216X180N 73.829,32.358 r270 top (schematic designator C8)
C8G "10uF" CAPMP3216X180N 73.829,22.358 r270 top (schematic designator C8)
C8H "10uF" CAPMP3216X180N 73.829,12.358 r270 top (schematic designator C8)
C9A "100nF" CAPC1005X55N 76.525,83.55 r0 top (schematic designator C9)
C9B "100nF" CAPC1005X55N 76.525,73.55 r0 top (schematic designator C9)
C9C "100nF" CAPC1005X55N 76.525,63.5 r0 top (schematic designator C9)
C9D "100nF" CAPC1005X55N 76.525,53.55 r0 top (schematic designator C9)
C9E "100nF" CAPC1005X55N 76.525,43.55 r0 top (schematic designator C9)
C9F "100nF" CAPC1005X55N 76.525,33.55 r0 top (schematic designator C9)
C9G "100nF" CAPC1005X55N 76.525,23.55 r0 top (schematic designator C9)
C9H "100nF" CAPC1005X55N 76.525,13.55 r0 top (schematic designator C9)
C10A "100nF" CAPC1005X55N 76.415,75.948 r0 top (schematic designator C10)
C10B "100nF" CAPC1005X55N 76.415,65.948 r0 top (schematic designator C10)
C10C "100nF" CAPC1005X55N 76.428,55.904 r0 top (schematic designator C10)
C10D "100nF" CAPC1005X55N 76.415,45.948 r0 top (schematic designator C10)
C10E "100nF" CAPC1005X55N 76.415,35.948 r0 top (schematic designator C10)
C10F "100nF" CAPC1005X55N 76.415,25.948 r0 top (schematic designator C10)
C10G "100nF" CAPC1005X55N 76.415,15.948 r0 top (schematic designator C10)
C10H "100nF" CAPC1005X55N 76.415,5.948 r0 top (schematic designator C10)
C11A "10uF" CAPMP3216X180N 66.694,76.63 r0 top (schematic designator C11)
C11B "10uF" CAPMP3216X180N 66.694,66.63 r0 top (schematic designator C11)
C11C "10uF" CAPMP3216X180N 66.707,56.586 r0 top (schematic designator C11)
C11D "10uF" CAPMP3216X180N 66.694,46.63 r0 top (schematic designator C11)
C11E "10uF" CAPMP3216X180N 66.694,36.63 r0 top (schematic designator C11)
C11F "10uF" CAPMP3216X180N 66.694,26.63 r0 top (schematic designator C11)
C11G "10uF" CAPMP3216X180N 66.694,16.63 r0 top (schematic designator C11)
C11H "10uF" CAPMP3216X180N 66.694,6.63 r0 top (schematic designator C11)
C12A "47nF" CAPC2012X135N 91.344,83.83 r0 top (schematic designator C12)
C12B "47nF" CAPC2012X135N 91.344,73.83 r0 top (schematic designator C12)
C12C "47nF" CAPC2012X135N 91.357,63.786 r0 top (schematic designator C12)
C12D "47nF" CAPC2012X135N 91.344,53.83 r0 top (schematic designator C12)
C12E "47nF" CAPC2012X135N 91.344,43.83 r0 top (schematic designator C12)
C12F "47nF" CAPC2012X135N 91.344,33.83 r0 top (schematic designator C12)
C12G "47nF" CAPC2012X135N 91.344,23.83 r0 top (schematic designator C12)
C12H "47nF" CAPC2012X135N 91.344,13.83 r0 top (schematic designator C12)
C13A "100nF" CAPC1005X55N 88.744,83.43 r0 top (schematic designator C13)
C13B "100nF" CAPC1005X55N 88.744,73.43 r0 top (schematic designator C13)
C13C "100nF" CAPC1005X55N 88.757,63.386 r0 top (schematic designator C13)
C13D "100nF" CAPC1005X55N 88.744,53.43 r0 top (schematic designator C13)
C13E "100nF" CAPC1005X55N 88.744,43.43 r0 top (schematic designator C13)
C13F "100nF" CAPC1005X55N 88.744,33.43 r0 top (schematic designator C13)
C13G "100nF" CAPC1005X55N 88.744,23.43 r0 top (schematic designator C13)
C13H "100nF" CAPC1005X55N 88.744,13.43 r0 top (schematic designator C13)
C14A "100nF" CAPC1005X55N 93.944,76.13 r180 top (schematic designator C14)
C14B "100nF" CAPC1005X55N 93.944,66.13 r180 top (schematic designator C14)
C14C "100nF" CAPC1005X55N 93.957,56.086 r180 top (schematic designator C14)
C14D "100nF" CAPC1005X55N 93.944,46.13 r180 top (schematic designator C14)
C14E "100nF" CAPC1005X55N 93.944,36.13 r180 top (schematic designator C14)
C14F "100nF" CAPC1005X55N 93.944,26.13 r180 top (schematic designator C14)
C14G "100nF" CAPC1005X55N 93.944,16.13 r180 top (schematic designator C14)
C14H "100nF" CAPC1005X55N 93.944,6.13 r180 top (schematic designator C14)
C15 "100nF" CAPC1005X55N 14.093,91.268 r180 top
C16 "100nF" CAPC1005X55N 181.7,42.15 r180 top
C17 "100nF" CAPC1005X55N 181.05,56.1 r180 top
C18 "100nF" CAPC1005X55N 166.728,52.169 r180 top
C19 "100nF" CAPC1005X55N 181.677,47.395 r180 top
C20 "100nF" CAPC1005X55N 181.677,36.895 r180 top
C21 "100nF" CAPC1005X55N 181.677,31.62 r180 top
C22 "100nF" CAPC1005X55N 181.677,26.37 r180 top
C23 "100nF" CAPC1005X55N 181.677,21.12 r180 top
C24 "100nF" CAPC1005X55N 166.728,59.669 r180 top
C25 "100nF" CAPC1005X55N 161.228,55.169 r180 top
C26 "1uF" CAPC1608X87N 125.178,21.01 r180 top
C27 "100nF" CAPC1005X55N 161.227,47.669 r180 top
C28 "100nF" CAPC1005X55N 166.628,44.7 r180 top
C29 "100nF" CAPC1005X55N 135.525,7.75 r90 top
C30 "100nF" CAPC1005X55N 161.227,40.17 r180 top
C31 "100nF" CAPC1005X55N 22.088,-2.031 r0 top
C32 "100nF" CAPC1005X55N 105.802,80.554 r0 top
C33 "100nF" CAPC1005X55N 107.8,10.6 r90 top
C37 "1uF" CAPC1608X87N 128.179,49.409 r90 top
C38 "10uF" CAPMP3216X180N 118.425,52.325 r90 top
C39 "100nF" CAPC1005X55N 120.75,51.425 r180 top
C40 "10nF" CAPC1005X55N 118.243,46.298 r0 top
C41 "1uF" CAPC1608X87N 120.144,12.519 r90 top
C42 "10nF" CAPC1005X55N 123.175,10.4 r180 top
C43 "1uF" CAPC1608X87N 127.275,16.8 r180 top
C44 "10uF" CAPMP3216X180N 118.225,12.832 r270 top
C45 "100nF" CAPC1005X55N 118.225,15.8 r180 top
C46 "10nF" CAPC1005X55N 121.412,19.2 r180 top
C47 "10uF" CAPMP3216X180N 127.375,13.5 r270 top
C48 "22uF" CAPC2012X135N 122.044,85.88 r270 top
C49 "22uF" CAPC2012X135N 122.194,76.88 r0 top
C50 "10uF" CAPMP3216X180N 123.387,73.306 r270 top
C51 "1uF" CAPC1608X87N 119.319,69.4 r90 top
C52 "10uF" CAPMP3216X180N 157.5,64.5 r270 top
C53 "22uF" CAPC2012X135N 154.7,71.9 r270 top
C54 "22uF" CAPC2012X135N 157.5,71.9 r270 top
C55 "22uF" CAPC2012X135N 149.753,62.901 r0 top
C56 "22uF" CAPC2012X135N 149.753,60.742 r0 top
C57 "22uF" CAPC2012X135N 166,67.025 r90 top
C58 "22uF" CAPC2012X135N 131.7,64.1 r90 top
C59 "22uF" CAPC2012X135N 123.6,62.25 r90 top
C60 "10uF" CAPMP3216X180N 123.6,66.5 r270 top
C61 "1uF" CAPC1608X87N 125.178,22.535 r180 top
C62 "10uF" CAPMP3216X180N 125.078,25.76 r270 top
C63 "10uF" CAPMP3216X180N 117.675,21.6 r90 top
C64 "100nF" CAPC1005X55N 117.7,24.7 r0 top
C65 "1uF" CAPC1608X87N 132.075,17.125 r0 top
C66 "1uF" CAPC1608X87N 137.391,64.77 r270 top
C67 "10uF" CAPMP3216X180N 145.85,47.88 r180 top
C68 "22uF" CAPC2012X135N 124.15,40.9 r270 top
C69 "100nF" CAPC1005X55N 147.512,59.044 r90 top
C70 "22uF" CAPC2012X135N 145.048,59.018 r0 top
C71 "1uF" CAPC1608X87N 117.65,40 r90 top
C72 "1uF" CAPC1608X87N 136.825,10.75 r90 top
C73 "100nF" CAPC1005X55N 141.141,65.77 r180 top
C74 "22uF" CAPC2012X135N 139.409,64.555 r270 top
C75 "10nF" CAPC1005X55N 120.7,37.85 r180 top
C76 "100nF" CAPC1005X55N 117.65,42 r0 top
C77 "10uF" CAPMP3216X180N 115.55,42 r90 top
C78 "100nF" CAPC1005X55N 135.641,57.27 r90 top
C79 "22uF" CAPC2012X135N 129.2,57.8 r270 top
C80 "10uF" CAPMP3216X180N 131.444,47.88 r180 top
C81 "22uF" CAPC2012X135N 132.25,32.1 r90 top
C82 "10nF" CAPC1005X55N 122.596,29.389 r0 top
C83 "100nF" CAPC1005X55N 123.046,32.75 r90 top
C84 "10uF" CAPMP3216X180N 119.15,31.1 r270 top
C85 "100nF" CAPC1005X55N 139.391,59.02 r180 top
C86 "22uF" CAPC2012X135N 138.141,57.27 r0 top
C87 "100nF" CAPC1005X55N 103.932,31.2 r90 top
C88 "100nF" CAPC1005X55N 102.433,31.2 r90 top
C89 "100nF" CAPC1005X55N 105.758,43.897 r270 top
C90 "100nF" CAPC1005X55N 101.95,43.197 r180 top
C91 "10uF" CAPC2012X95N 100.655,30.657 r90 top
C92 "100nF" CAPC1005X55N 109.534,36.232 r270 top
C93 "100nF" CAPC1005X55N 109.534,39.346 r270 top
C94 "10uF" CAPC2012X95N 112.252,41.13 r270 top
C95 "10uF" CAPC2012X95N 105.444,30.38 r90 top
C96 "10uF" CAPC2012X95N 98.569,35.466 r90 top
C97 "10uF" CAPC2012X95N 98.569,38.895 r270 top
C98 "10uF" CAPC2012X95N 104.215,44.221 r270 top
C99 "10uF" CAPC2012X95N 98.569,31.542 r90 top
C100 "2.2uF" CAPC1608X87N 104.983,21.6 r270 top
C101 "1uF" CAPC1608X87N 104.983,13.803 r270 top
C102 "1uF" CAPC1608X87N 104.983,18.5 r270 top
C103 "47nF" CAPC2012X135N 108.611,57.813 r270 top
C104 "100nF" CAPC1005X55N 106.556,59.995 r0 top
C105 "100nF" CAPC1005X55N 102.25,55.5 r180 top
C106 "47nF" CAPC2012X135N 103,60.5 r0 top
CLIP1 "S1411-46R" CLIP_HOLLAND-SHIELDING_LC 30.944,79.88 r90 top
CLIP2 "S1411-46R" CLIP_HOLLAND-SHIELDING_LC 30.944,9.6 r90 top
CLIP3 "S1411-46R" CLIP_HOLLAND-SHIELDING_LC 110.944,26.88 r90 top
CLIP4 "S1411-46R" CLIP_HOLLAND-SHIELDING_LC 110.944,64.88 r90 top
CLIP5 "S1411-46R" CLIP_HOLLAND-SHIELDING_LC 30.944,27.88 r90 top
CLIP6 "S1411-46R" CLIP_HOLLAND-SHIELDING_LC 30.944,45 r90 top
CLIP7 "S1411-46R" CLIP_HOLLAND-SHIELDING_LC 30.944,66.5 r90 top
CLIP8 "S1411-46R" CLIP_HOLLAND-SHIELDING_LC 51.444,89.88 r180 top
CLIP9 "S1411-46R" CLIP_HOLLAND-SHIELDING_LC 71,89.88 r180 top
CLIP10 "S1411-46R" CLIP_HOLLAND-SHIELDING_LC 89,89.88 r180 top
CLIP11 "S1411-46R" CLIP_HOLLAND-SHIELDING_LC 110.944,82.88 r90 top
CLIP12 "S1411-46R" CLIP_HOLLAND-SHIELDING_LC 110.944,47.88 r90 top
CLIP13 "S1411-46R" CLIP_HOLLAND-SHIELDING_LC 39.444,-0.12 r180 top
CLIP14 "S1411-46R" CLIP_HOLLAND-SHIELDING_LC 89,-0.12 r180 top
CLIP15 "S1411-46R" CLIP_HOLLAND-SHIELDING_LC 110.944,7.88 r90 top
CLIP16 "S1411-46R" CLIP_HOLLAND-SHIELDING_LC 71,-0.12 r180 top
CLIP17 "S1411-46R" CLIP_HOLLAND-SHIELDING_LC 51.444,-0.12 r180 top
CLIP18 "S1411-46R" CLIP_HOLLAND-SHIELDING_LC 38.444,89.88 r180 top
D1A "BAV199" SOT95P240X110-3N 70.933,81.418 r270 top (schematic designator D1)
D1B "BAV199" SOT95P240X110-3N 70.933,71.418 r270 top (schematic designator D1)
D1C "BAV199" SOT95P240X110-3N 70.946,61.374 r270 top (schematic designator D1)
D1D "BAV199" SOT95P240X110-3N 70.933,51.418 r270 top (schematic designator D1)
D1E "BAV199" SOT95P240X110-3N 70.933,41.418 r270 top (schematic designator D1)
D1F "BAV199" SOT95P240X110-3N 70.933,31.418 r270 top (schematic designator D1)
D1G "BAV199" SOT95P240X110-3N 70.933,21.418 r270 top (schematic designator D1)
D1H "BAV199" SOT95P240X110-3N 70.933,11.418 r270 top (schematic designator D1)
D2A "BAV199" SOT95P240X110-3N 70.933,77.506 r90 top (schematic designator D2)
D2B "BAV199" SOT95P240X110-3N 70.933,67.506 r90 top (schematic designator D2)
D2C "BAV199" SOT95P240X110-3N 70.946,57.462 r90 top (schematic designator D2)
D2D "BAV199" SOT95P240X110-3N 70.933,47.506 r90 top (schematic designator D2)
D2E "BAV199" SOT95P240X110-3N 70.933,37.506 r90 top (schematic designator D2)
D2F "BAV199" SOT95P240X110-3N 70.933,27.506 r90 top (schematic designator D2)
D2G "BAV199" SOT95P240X110-3N 70.933,17.506 r90 top (schematic designator D2)
D2H "BAV199" SOT95P240X110-3N 70.933,7.506 r90 top (schematic designator D2)
D5 "SMBJ12A" DIOM5336X265N 80.169,87.13 r0 top
D6 "SMBJ12A" DIOM5336X265N 79.694,3.13 r180 top
D7 "1N4148WS" SODFL2512X100N 134.511,18.242 r270 top
D8 "1N4148WS" SODFL2512X100N 134.641,64.77 r0 top
D9 "1N4148WS" SODFL2512X100N 132.286,7.742 r0 top
D10 "1N4148WS" SODFL2512X100N 132,45.9 r180 top
FTG1 "Use only in PCB" FIDUCIAL_TOP_C100-200 192,90.5 r90 top
FTG2 "Use only in PCB" FIDUCIAL_TOP_S100-200 6.5,7.5 r90 top
FTG3 "Use only in PCB" FIDUCIAL_TOP_S100-200 182.5,-1.1 r90 top
FTG4 "Use only in PCB" FIDUCIAL_TOP_C100-200 192,90.5 r90 bottom
FTG5 "Use only in PCB" FIDUCIAL_TOP_S100-200 6.5,7.5 r90 bottom
FTG6 "Use only in PCB" FIDUCIAL_TOP_S100-200 182.5,-1.1 r90 bottom
IC1A "OPA2197IDGKR" SOP65P490X110-8N 91.444,79.109 r90 top (schematic designator IC1)
IC1B "OPA2197IDGKR" SOP65P490X110-8N 91.444,69.109 r90 top (schematic designator IC1)
IC1C "OPA2197IDGKR" SOP65P490X110-8N 91.457,59.065 r90 top (schematic designator IC1)
IC1D "OPA2197IDGKR" SOP65P490X110-8N 91.444,49.109 r90 top (schematic designator IC1)
IC1E "OPA2197IDGKR" SOP65P490X110-8N 91.444,39.109 r90 top (schematic designator IC1)
IC1F "OPA2197IDGKR" SOP65P490X110-8N 91.444,29.109 r90 top (schematic designator IC1)
IC1G "OPA2197IDGKR" SOP65P490X110-8N 91.444,19.109 r90 top (schematic designator IC1)
IC1H "OPA2197IDGKR" SOP65P490X110-8N 91.444,9.109 r90 top (schematic designator IC1)
IC2A "AD8253ARMZ" SOP50P490X110-10N 76.775,79.767 r90 top (schematic designator IC2)
IC2B "AD8253ARMZ" SOP50P490X110-10N 76.775,69.767 r90 top (schematic designator IC2)
IC2C "AD8253ARMZ" SOP50P490X110-10N 76.788,59.723 r90 top (schematic designator IC2)
IC2D "AD8253ARMZ" SOP50P490X110-10N 76.775,49.767 r90 top (schematic designator IC2)
IC2E "AD8253ARMZ" SOP50P490X110-10N 76.775,39.767 r90 top (schematic designator IC2)
IC2F "AD8253ARMZ" SOP50P490X110-10N 76.775,29.767 r90 top (schematic designator IC2)
IC2G "AD8253ARMZ" SOP50P490X110-10N 76.775,19.767 r90 top (schematic designator IC2)
IC2H "AD8253ARMZ" SOP50P490X110-10N 76.775,9.767 r90 top (schematic designator IC2)
IC3 "PCF8574ADWR" SOIC127P1030X265-16N 18.05,84.9 r90 top
IC4 "FIN1101K8X" SOP50P310X90-8N 182.917,57.914 r180 top
IC5 "FIN1101K8X" SOP50P310X90-8N 166.728,49.444 r90 top
IC6 "SN65LVDS2DBVR" SOT95P280X145-5N 182.177,49.97 r90 top
IC7 "SN65LVDS2DBVR" SOT95P280X145-5N 182.177,44.72 r90 top
IC8 "SN65LVDS2DBVR" SOT95P280X145-5N 182.177,39.47 r90 top
IC9 "SN65LVDS2DBVR" SOT95P280X145-5N 182.177,34.22 r90 top
IC10 "SN65LVDS1DBVT" SOT95P280X145-5N 182.177,28.97 r90 top
IC11 "SN65LVDS2DBVR" SOT95P280X145-5N 182.177,23.72 r90 top
IC12 "PCF8574ADWR" SOIC127P1030X265-16N 18.1,4.35 r270 top
IC13 "FIN1101K8X" SOP50P310X90-8N 166.728,56.944 r90 top
IC14 "FIN1101K8X" SOP50P310X90-8N 161.228,52.444 r90 top
IC15 "FIN1101K8X" SOP50P310X90-8N 161.227,44.944 r90 top
IC16 "FIN1101K8X" SOP50P310X90-8N 166.728,41.945 r90 top
IC17 "FIN1101K8X" SOP50P310X90-8N 161.227,37.445 r90 top
IC18A "TLP170AM" TOSHIBA_11-4M1S 46.8,80.32 r270 top (schematic designator IC18)
IC18B "TLP170AM" TOSHIBA_11-4M1S 46.8,70.32 r270 top (schematic designator IC18)